# Altium PCB Interface-Board-v4.0.PcbDoc (part 1 of 3)
Units mil, origin at the board's own origin, x right, y up, seen from the top; angles counter-clockwise.
Board outline 1665.35 x 1665.35 mil, 4 copper layers (Top Layer, PWR, GND, Bottom Layer), stack 61.654 mil thick; 98 components, 76 nets, 345 pads, 193 vias.
Unrouted connection lines stored in the file: 69.
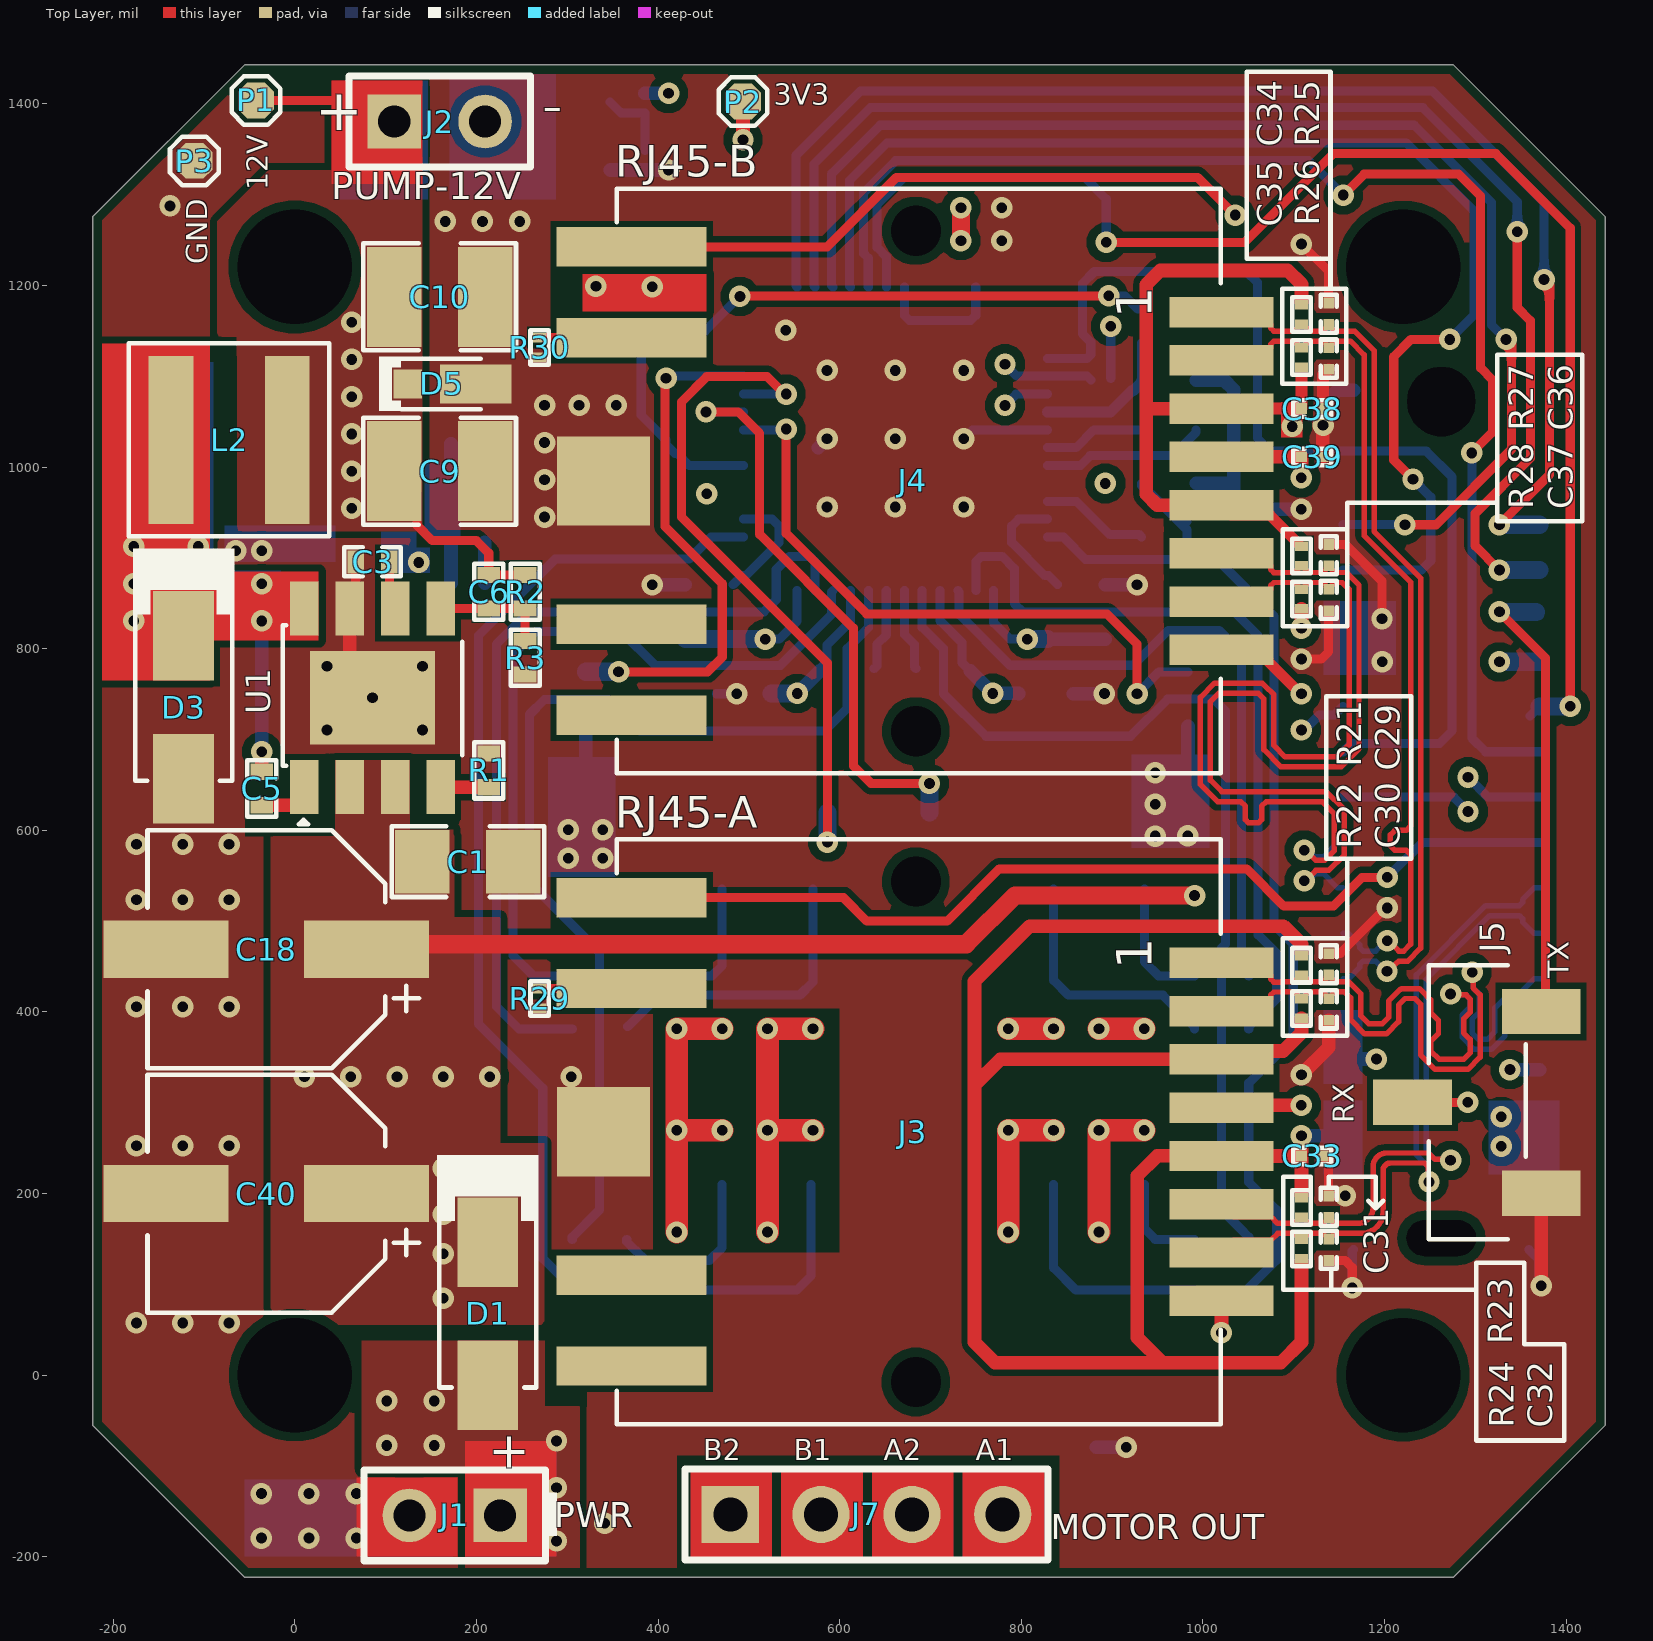
[diagram p0: Top Layer view]
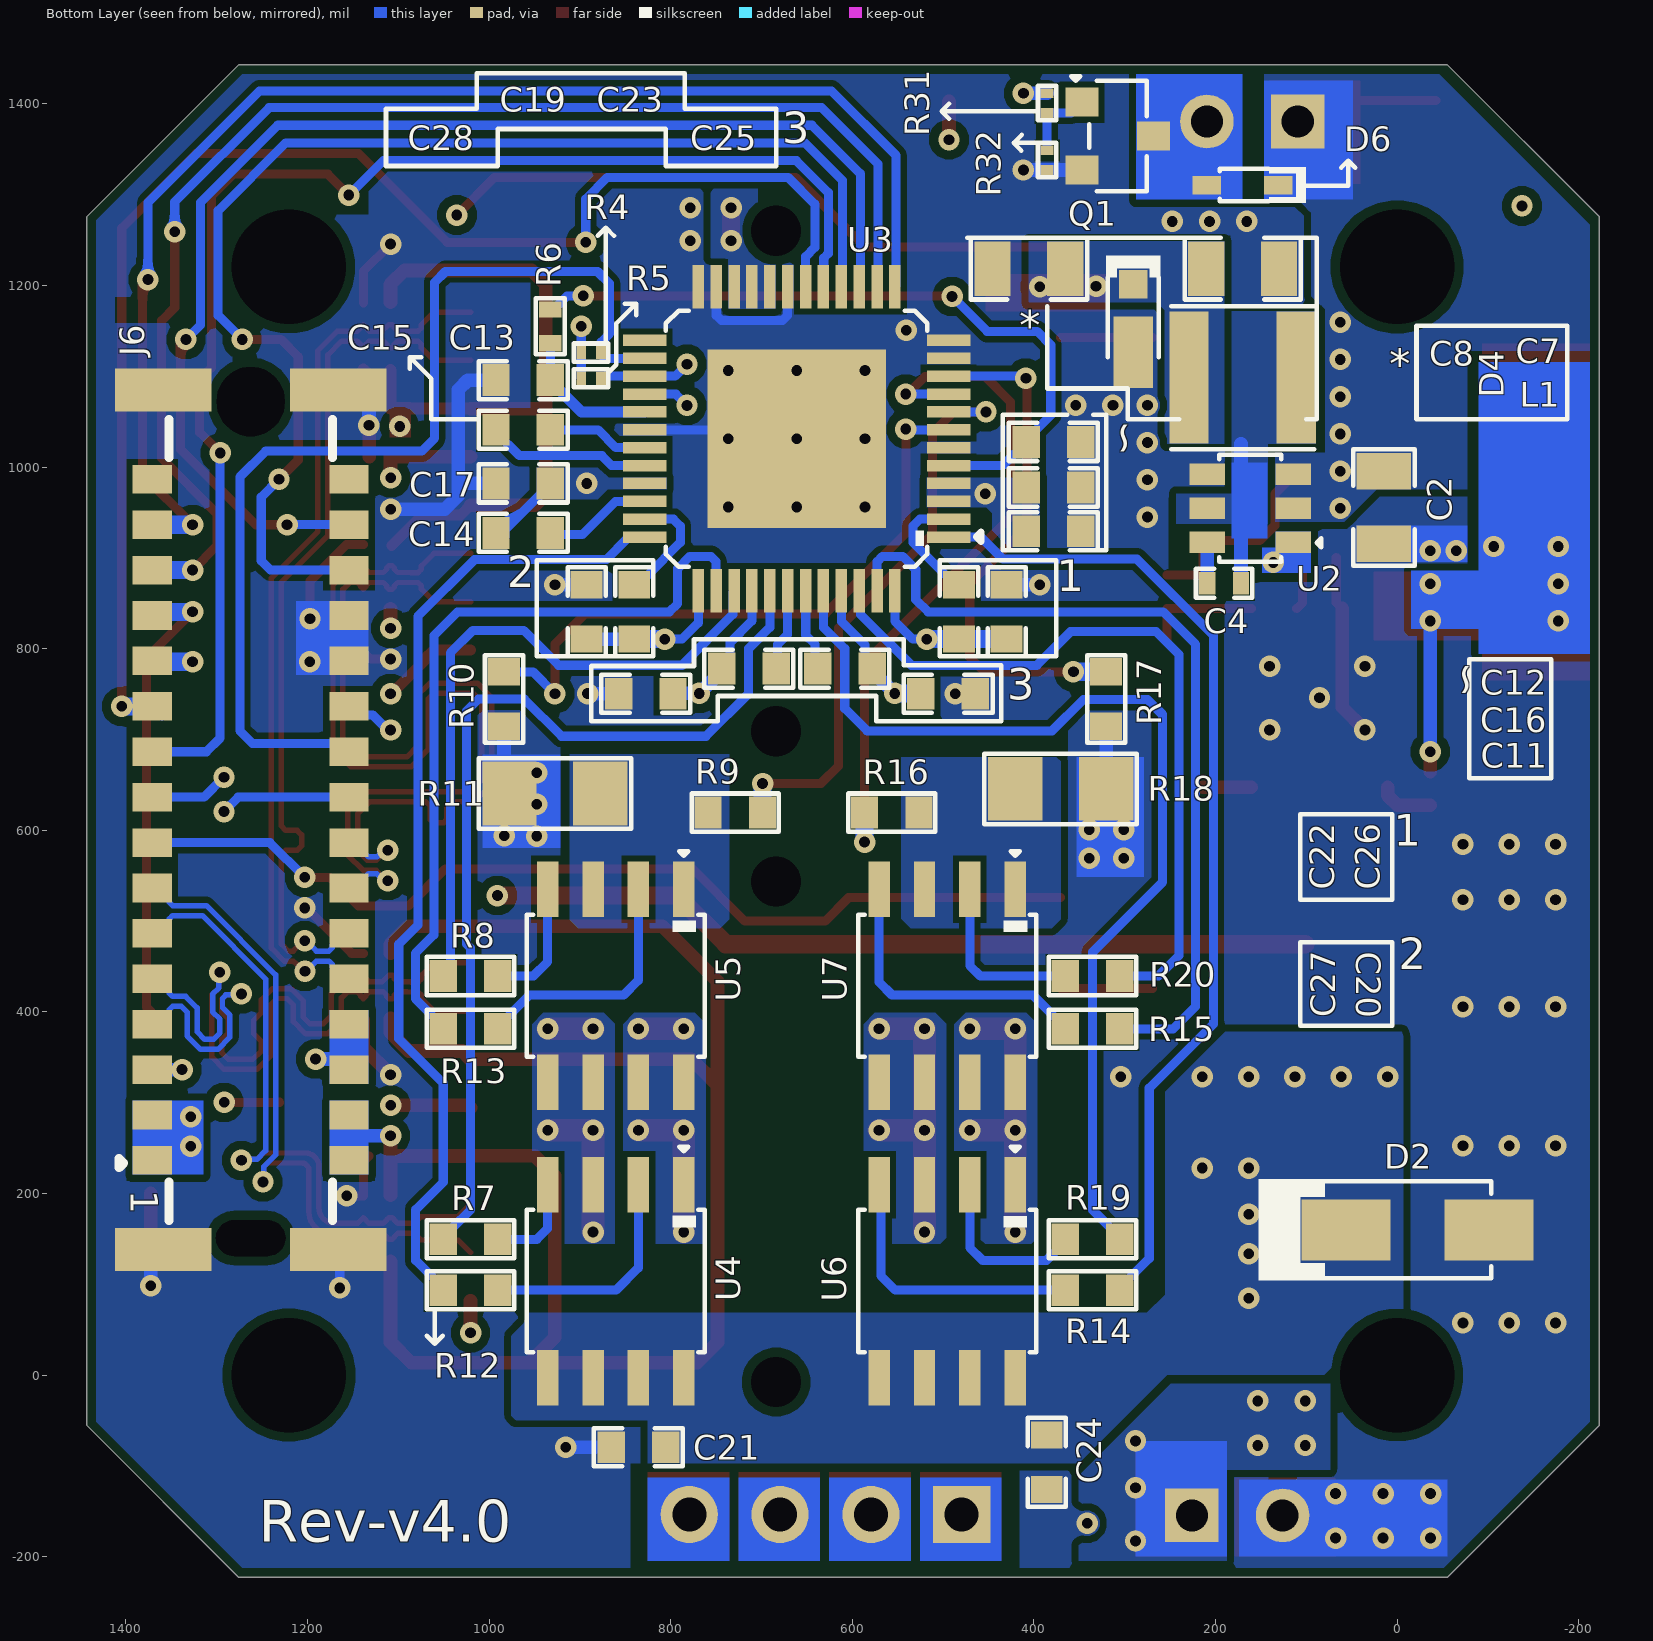
[diagram p1: Bottom Layer view, seen from below]
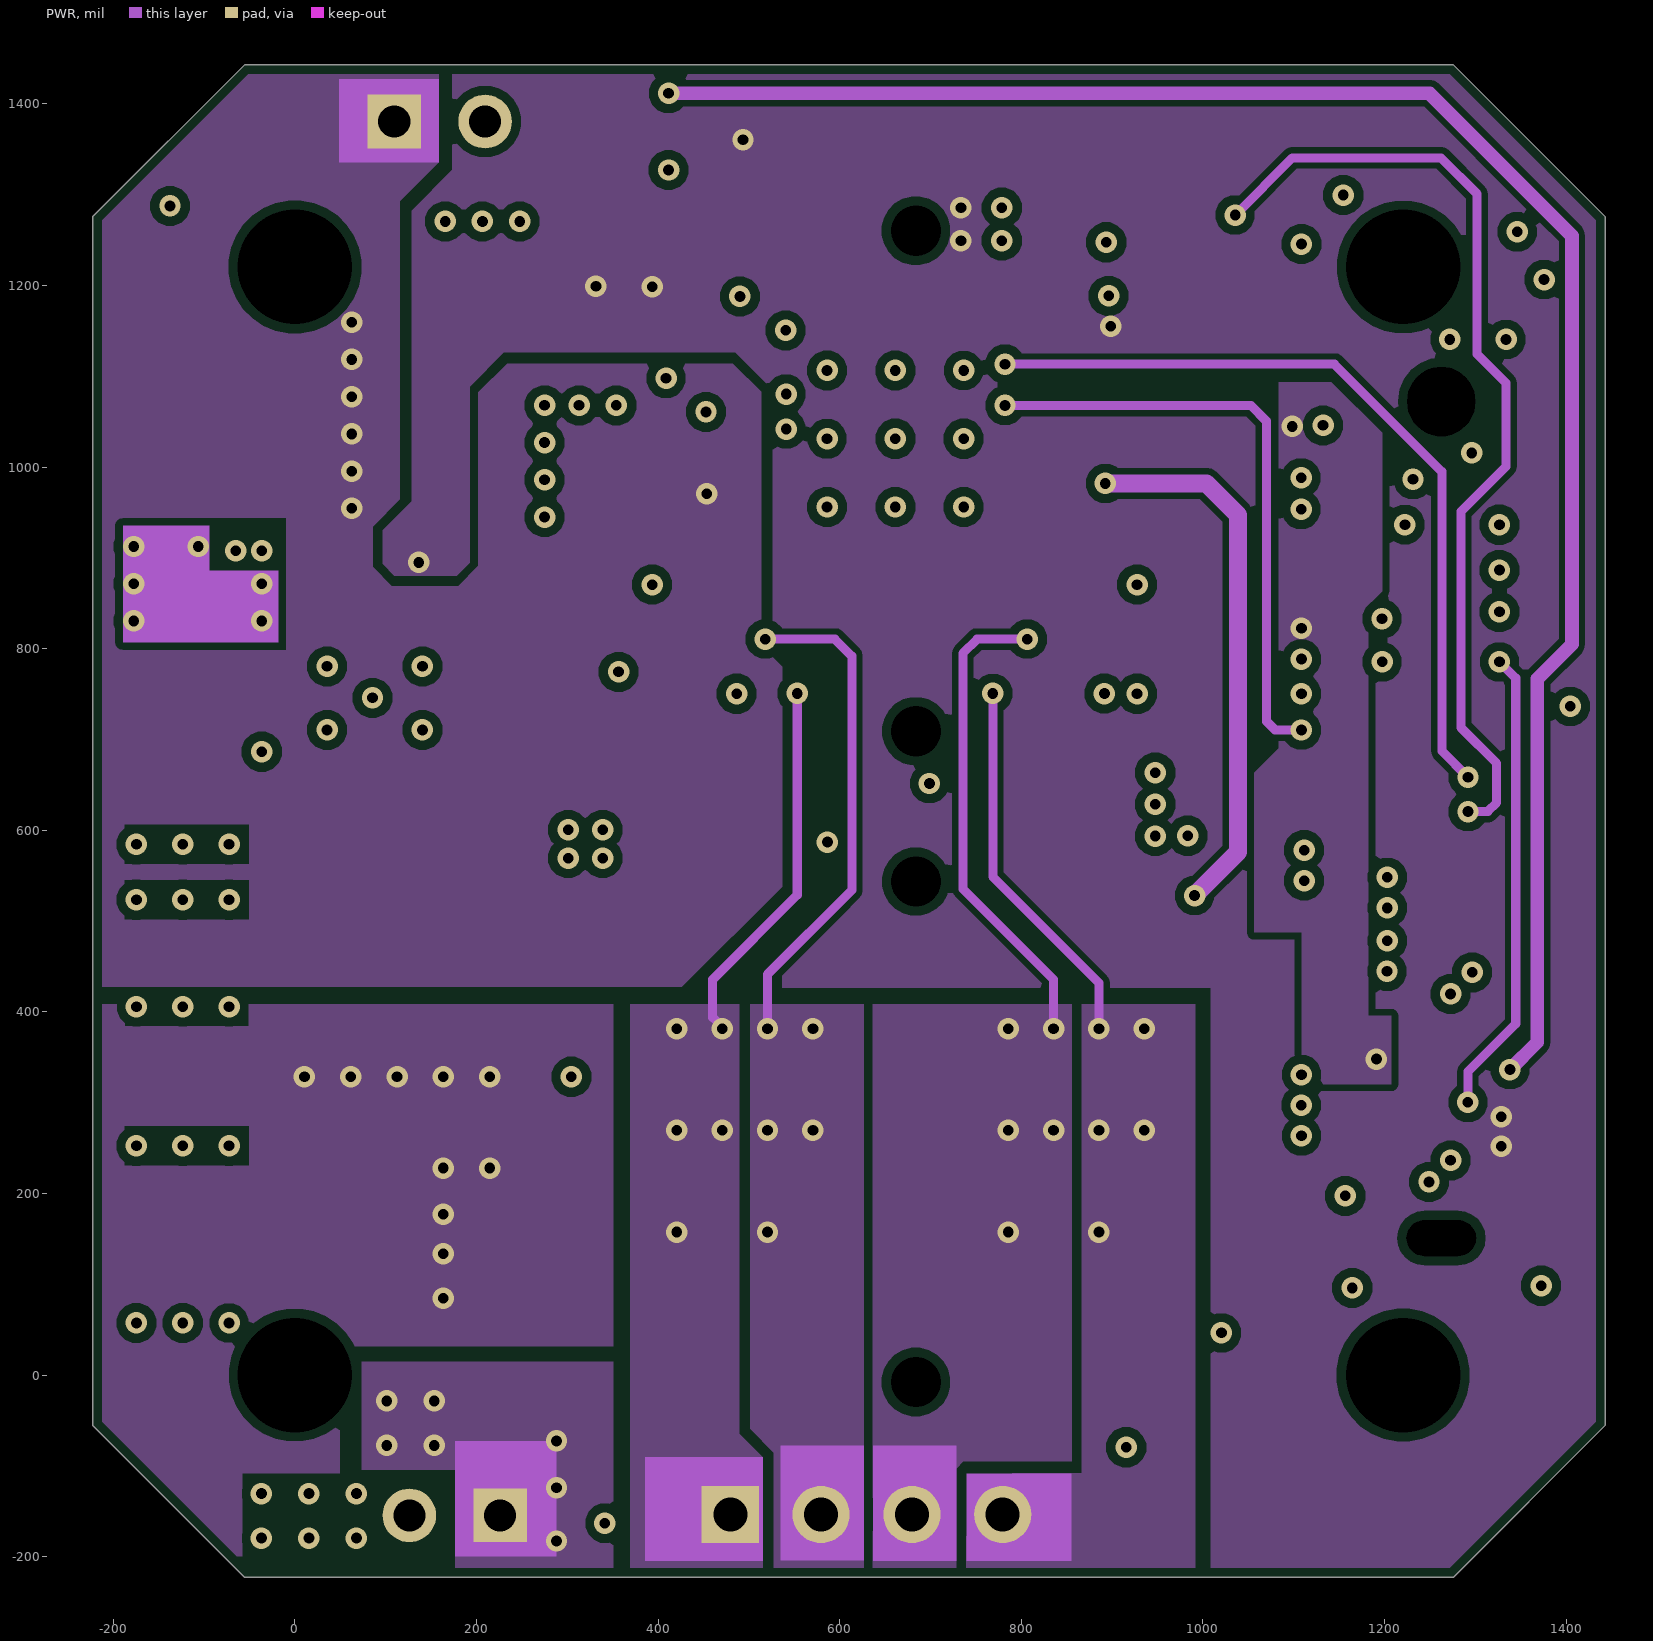
[diagram p2: PWR]
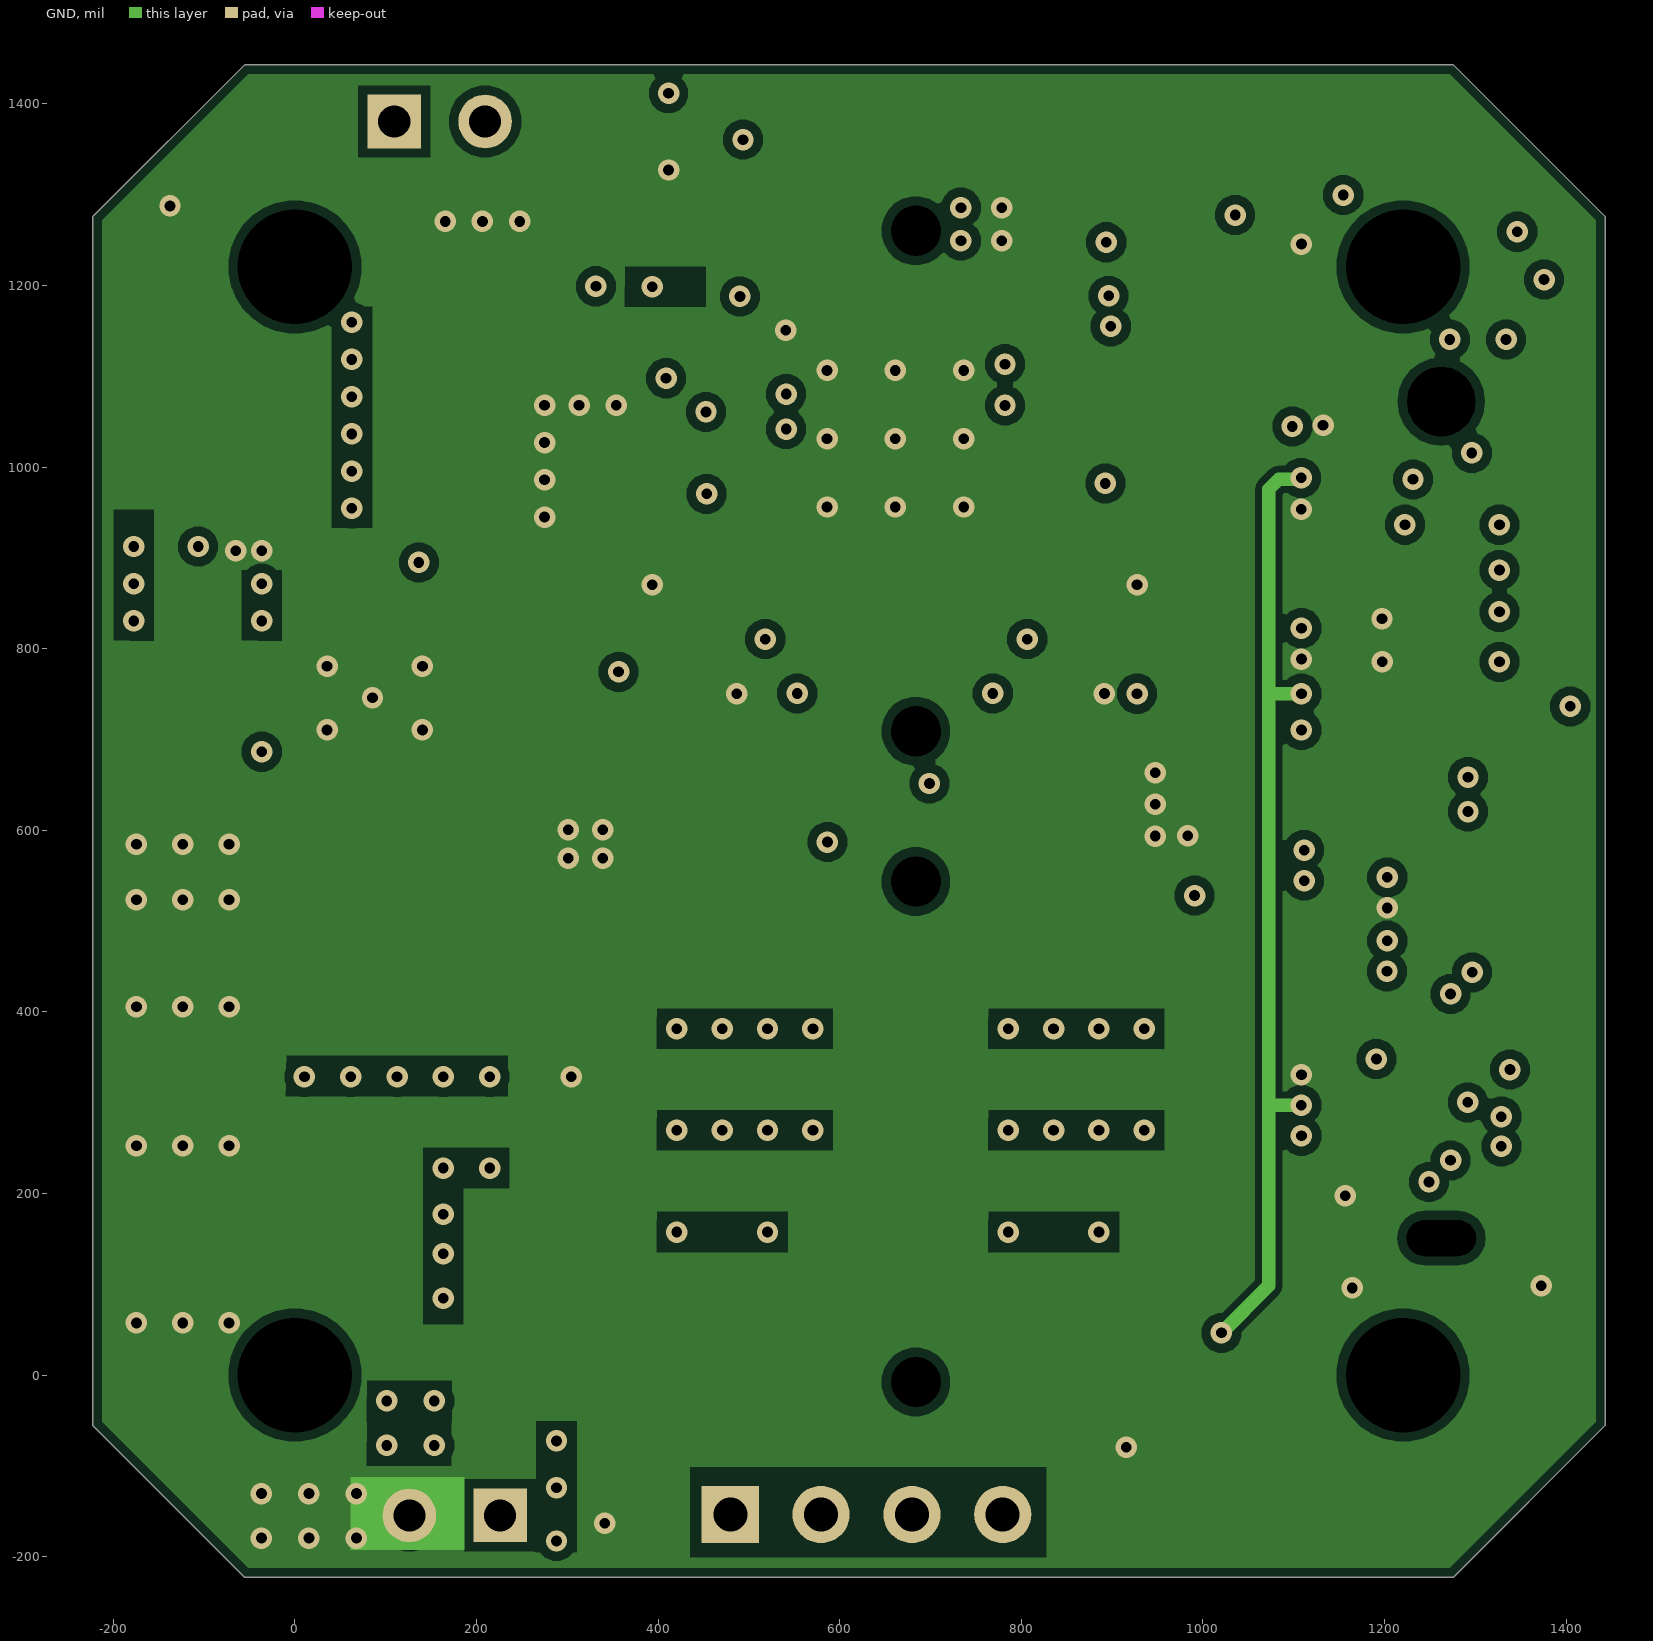
[diagram p3: GND]
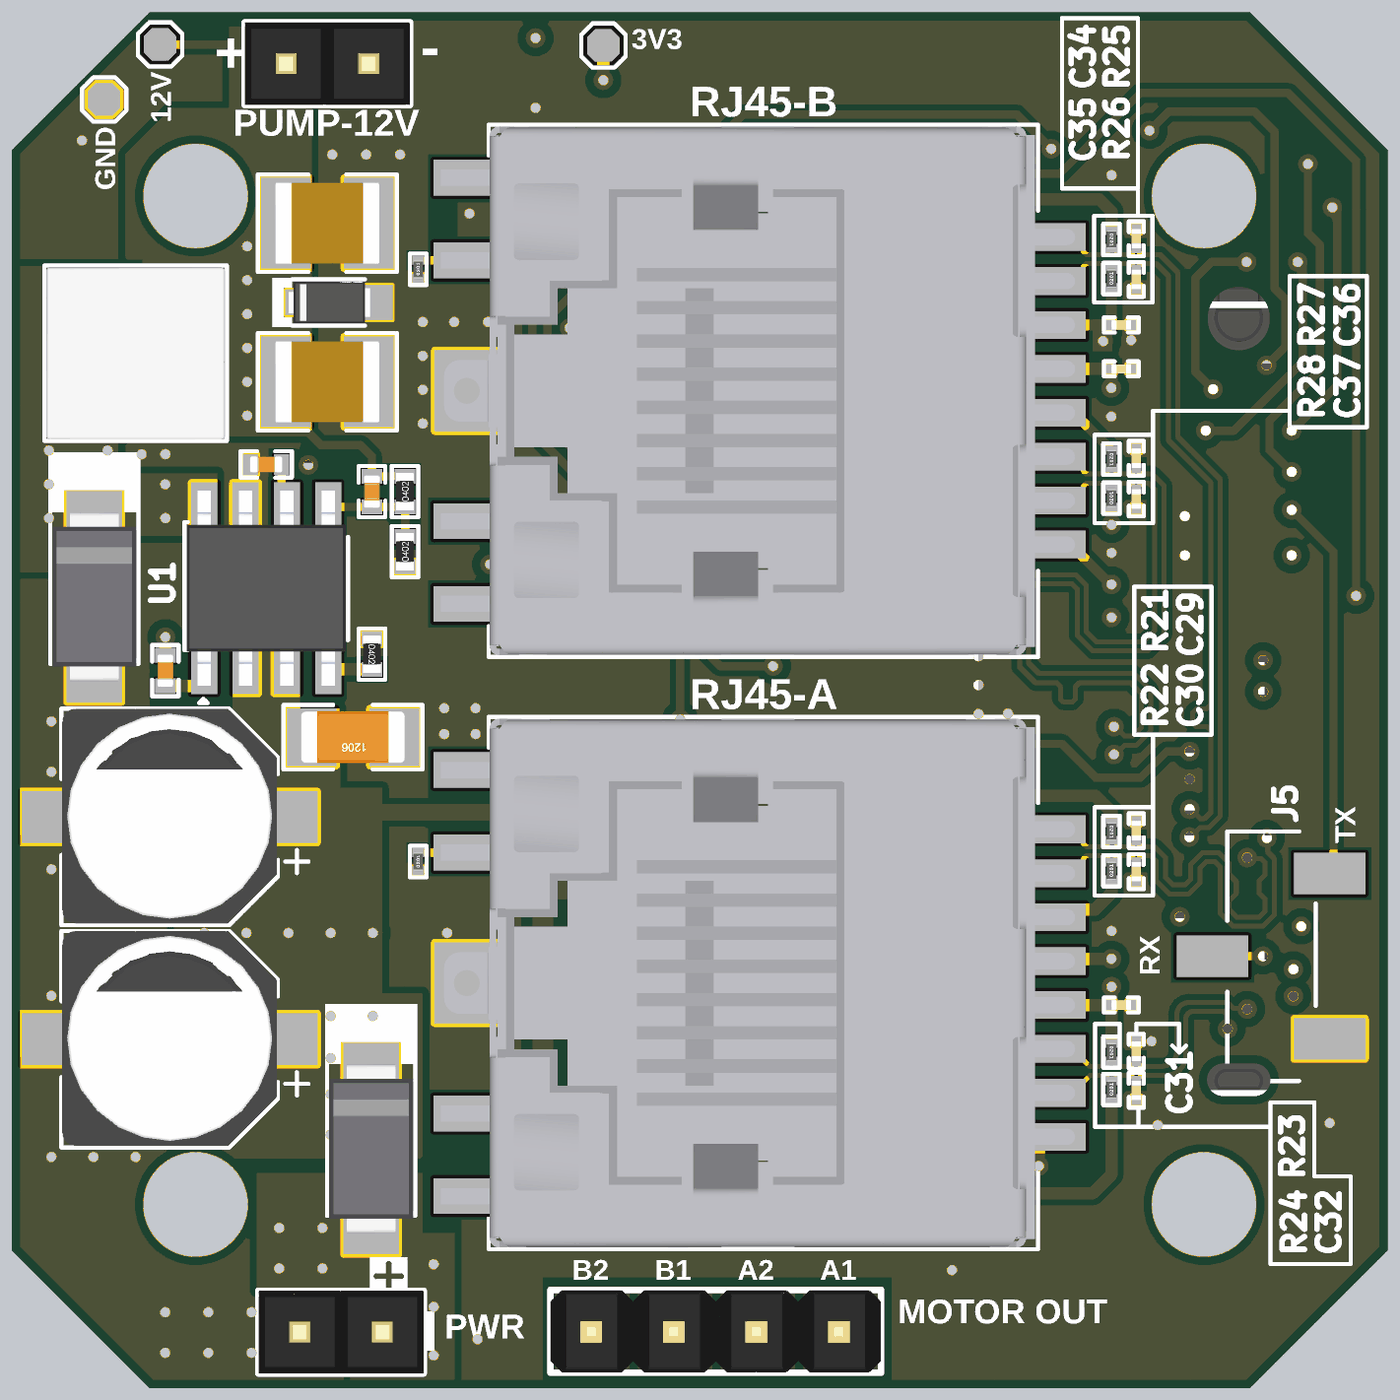
[diagram p5: 3D render of the assembled board from above, using the file's embedded part models]
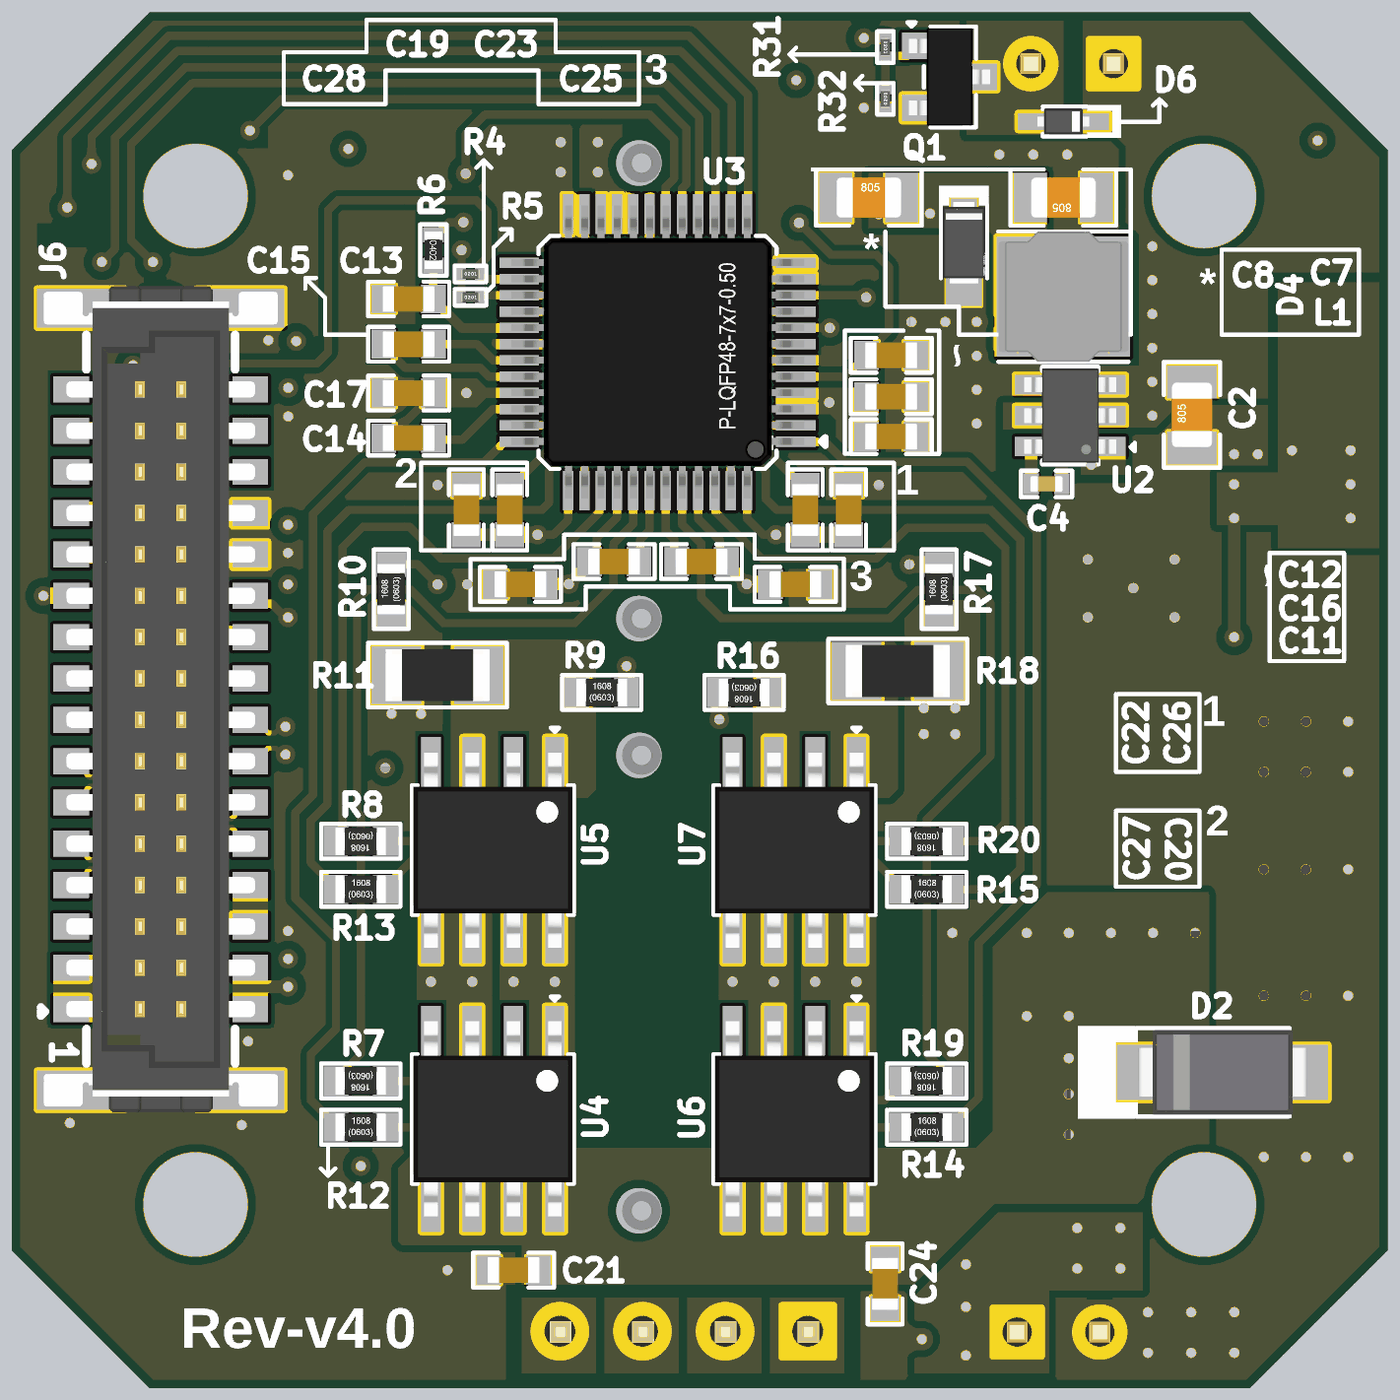
[diagram p6: 3D render of the assembled board from below, using the file's embedded part models]

## Layer stack, top to bottom
Top Solder: solder mask 0.7087, Solder Resist, Dk 3.5
Top Layer: signal copper 1.378
Dielectric 2: prepreg 7.9921, PP-006, Dk 4.4
PWR: signal copper 1.1811
Dielectric 1: core 40.5512, FR-4, Dk 4.6
GND: signal copper 1.1811
Dielectric 3: prepreg 7.9921, PP-006, Dk 4.4
Bottom Layer: signal copper 1.378
Bottom Solder: solder mask 0.7087, Solder Resist, Dk 3.5

## Board outline
-222.44,-55.41 -222.44,1275.88 -55.41,1442.91 1275.88,1442.91 1442.91,1275.88 1442.91,-55.41 1275.88,-222.44 -55.41,-222.44

## Design rules (kind name [scope] priority, off if disabled: settings)
BoardOutlineClearance [All] p1: gap=0 ignorepadtopadclearanceinfootprint=FALSE except(10: Poly-OutlineEdge)
Clearance [All] p1: gap=10 ignorepadtopadclearanceinfootprint=TRUE except(0: Arc-Hole Track-Hole SMDPad-Hole THPad-Hole Via-Hole Fill-Hole Region-Hole Text-Hole; 5: Arc-Arc Arc-Track Arc-SMDPad Track-Track Track-SMDPad; 7: Arc-Fill Arc-Poly Arc-Region Track-Fill Track-Poly Track-Region SMDPad-Fill SMDPad-Poly SMDPad-Region; 8: Fill-Fill Fill-Poly Fill-Region Poly-Poly Poly-Region Region-Region)
ComponentClearance [All] p1: gap=0 collisioncheckmode=3 verticalgap=0 showdistances=FALSE
DiffPairsRouting [All] p1: maxlimit=5 minlimit=5 mostfreqgap=5 toplayer_minwidth=6 toplayer_maxwidth=6 toplayer_prefwidth=6 midlayer1_minwidth=3.05 midlayer1_maxwidth=3.05 midlayer1_prefwidth=3.05 midlayer2_minwidth=3.05 midlayer2_maxwidth=3.05 midlayer2_prefwidth=3.05 bottomlayer_minwidth=6 bottomlayer_maxwidth=6 bottomlayer_prefwidth=6 impedanceprofiledriven=TRUE impedanceprofileid={466FECD8-43C7-4345-A135-0642FC9EC8CA} impedanceprofilevalue=100.000000 maxuncoupledlength=500
HoleSize [All] p1: absolutevalues=TRUE maxlimit=137.8 minlimit=1 maxpercent=80.000 minpercent=20.000
MatchedLengths "Schematic Matched Net Lengths_1" [InNetClass('EtherCAT_A')] p1: tolerance=20 checknetsindiffpair=FALSE checkdiffpairvsdiffpair=TRUE checkxsignals=TRUE checkothers=TRUE
MatchedLengths "Schematic Matched Net Lengths" [InNetClass('EtherCAT_B')] p2: tolerance=20 checknetsindiffpair=FALSE checkdiffpairvsdiffpair=TRUE checkxsignals=TRUE checkothers=TRUE
MaxMinImpedance "Schematic Impedance Constraint_1" [InNetClass('EtherCAT_A')] p1: minimum=85.00 maximum=95.00
MaxMinImpedance "Schematic Impedance Constraint" [InNetClass('EtherCAT_B')] p2: minimum=85.00 maximum=95.00
MinimumSolderMaskSliver [All] p1: minsoldermaskwidth=0
PolygonConnect [All] p1: thpad.connectstyle=Relief thpad.reliefconductorwidth=15 thpad.reliefentries=4 thpad.polygonreliefangle="45 Angle" thpad.airgapwidth=10 smdpad.connectstyle=Direct smdpad.reliefconductorwidth=10 smdpad.reliefentries=4 smdpad.polygonreliefangle="90 Angle" smdpad.airgapwidth=10 via.connectstyle=Direct via.reliefconductorwidth=10 via.reliefentries=4 via.polygonreliefangle="90 Angle" via.airgapwidth=10
RoutingVias [All] p1: holewidth=11.81 width=23.62 viastyle="Through Hole" minholewidth=11.81 minwidth=23.62 maxholewidth=11.81 maxwidth=23.62
SilkToSilkClearance [All] p1: silktosilkclearance=0
SilkToSolderMaskClearance [IsPad] p1: minsilkscreentomaskgap=0 clearancetoexposedcopper=TRUE
SolderMaskExpansion [All] p1: expansion=4 istentingtop=FALSE
UnRoutedNet [All] p1: checkbadconnections=TRUE
Width [All] p1: maxlimit=40 minlimit=7 preferedwidth=10
23 further rules are at their usual default settings.

## Classes and differential pairs
differential pair class EtherCAT_B_Lines: RXB TXB
differential pair class EtherCAT_A_Lines: RXA TXA
net class EtherCAT_B: RXB_N RXB_P TXB_N TXB_P
net class EtherCAT_A: RXA_N RXA_P TXA_N TXA_P
component class U_Stepper-Sheet: C11 C12 C13 C14 C15 C16 C17 C18 C19 C20 C21 C22 C23 C24 C25 C26 C27 C28 C40 R4 R5 R6 R7 R8 R9 R10 R11 R12 R13 R14 R15 R16 R17 R18 R19 R20 U3 U4 U5 U6 U7
component class U_Power-Sheet: C1 C2 C3 C4 C5 C6 C7 C8 C9 C10 D1 D2 D3 D4 D5 L1 L2 P1 P2 P3 R1 R2 R3 U1 U2
component class U_Connector-Sheet: C29 C30 C31 C32 C33 C34 C35 C36 C37 C38 C39 D6 J1 J2 J3 J4 J5 J6 J7 Q1 R21 R22 R23 R24 R25 R26 R27 R28 R29 R30 R31 R32
differential pair TXB: +TXB_P -TXB_N
differential pair TXA: +TXA_P -TXA_N
differential pair RXB: +RXB_P -RXB_N
differential pair RXA: +RXA_P -RXA_N

## Components (designator, comment, footprint, x,y, rotation, side; value= is the part's Value field where it differs from the comment)
C1 "4.7uF" Cap-1206 190.56,565.59 r180 top locked
C2 "10uF" Cap-0805 14.56,955.59 r90 bottom locked
C3 "15nF" Cap-0402 85.56,895.59 r0 top locked
C4 "0.1uF" Cap-0402 190.55,872.04 r180 bottom locked
C5 "0.1uF" Cap-0402 -36.44,646.09 r90 top locked
C6 "560pF" Cap-0402 213.56,862.75 r90 top locked
C7 "22uF" Cap-0805 170.19,1218.59 r0 bottom
C8 "22uF" Cap-0805 405.56,1218.59 r180 bottom
C9 "47uF" Cap-1210 159.56,995.59 r180 top locked
C10 "47uF" Cap-1210 159.56,1187.5 r180 top locked
C11 "2.2uF" CAP-0603 378.56,929.3 r0 bottom locked
C12 "2.2uF" CAP-0603 378.56,1027.73 r0 bottom locked
C13 "0.47uF" Cap-0603 962.56,1095.84 r180 bottom locked
C14 "0.1uF" Cap-0603 962.56,927.59 r0 bottom locked
C15 "22nF" Cap-0603 962.56,1041.11 r0 bottom locked
C16 "0.1uF" Cap-0603 378.56,977.59 r0 bottom locked
C17 "0.1uF" Cap-0603 962.56,982.06 r180 bottom locked
C18 "100uF" RVT1H101M0607 -31.5,469 r180 top locked
C19 "220nF" Cap-0603 713.86,778.09 r0 bottom locked
C20 "220nF" Cap-0603 840.16,840.59 r270 bottom locked
C21 "470nF" Cap-0603 835.56,-79.41 r0 bottom locked
C22 "220nF" Cap-0603 482.56,840.59 r270 bottom locked
C23 "220nF" Cap-0603 608.12,778.09 r180 bottom locked
C24 "470nF" Cap-0603 386,-96 r270 bottom
C25 "1nF" Cap-0603 494.61,750.43 r180 bottom locked
C26 "1nF" Cap-0603 430.09,840.59 r90 bottom locked
C27 "1nF" Cap-0603 892.61,840.59 r90 bottom locked
C28 "1nF" Cap-0603 827.37,750.43 r0 bottom locked
C29 "10pF" CAP-0201 1138.56,452.4 r90 top locked
C30 "10pF" CAP-0201 1138.56,402.8 r270 top locked
C31 "10pF" CAP-0201 1138.56,185.39 r90 top locked
C32 "10pF" CAP-0201 1138.56,138.11 r270 top locked
C33 "22nF" CAP-0201 1120.37,241.43 r0 top locked
C34 "10pF" CAP-0201 1138.56,1168.82 r90 top locked
C35 "10pF" CAP-0201 1138.56,1119.53 r270 top locked
C36 "10pF" CAP-0201 1138.56,903.07 r90 top locked
C37 "10pF" CAP-0201 1138.56,853.78 r270 top locked
C38 "22nF" CAP-0201 1120.37,1064.44 r0 top locked
C39 "1nF" CAP-0201 1120.37,1011.29 r0 top locked
C40 "100uF" RVT1H101M0607 -31.5,200 r180 top locked
D1 "SS56" SMA 212.56,67.59 r270 top locked
D2 "SMAJ48A" SMA -22.44,160 r180 bottom locked
D3 "SS36" SMA -122.44,735.59 r270 top locked
D4 "MSP3V3HM3/89A" MicroSMP 290.56,1163.99 r90 bottom
D5 "MSMP12A-M3/89A" MicroSMP 161.96,1091.59 r180 top locked
D6 "1N4148WT" SOD-523F 170.19,1310.59 r180 bottom locked
J1 "X6511WV-02H-C60D30" HDR1X2_ 226.13,-154.41 r180 top locked
J2 "X6511WV-02H-C60D30" HDR1X2_ 109.56,1380.59 r0 top locked
J3 "HR963370A" HR963370A 695.67,268 r90 top locked
J4 "HR963370A" HR963370A 695.67,984.72 r90 top locked
J5 "X6511WVS-03H-C60D48R1" HDR1X3-SMD 1301.64,300.48 r270 top locked
J6 "M55-7013242R" M55-7013242R 1262.56,611.56 r270 bottom locked
J7 "X6511WV-04H-C60D30" HDR1X4_ 479.56,-153.41 r0 top locked
L1 "3.9uH" FNR4030S3R9MT 170.19,1098.59 r0 bottom
L2 "15uH" FEXL0550A-150M -72.44,1030 r0 top locked
P1 "TEST POINT 0.5mm Dia" "Test-point - 0.5mm" -42.8,1403.84 r0 top locked
P2 "TEST POINT 0.5mm Dia" "Test-point - 0.5mm" 493.56,1402.59 r0 top locked
P3 "TEST POINT 0.5mm Dia" "Test-point - 0.5mm" -110.6,1337.3 r0 top locked
Q1 "IRLML2502TRPBF" SOT-23 307.93,1364.59 r270 bottom locked
R1 "45.3k" Res-0402 213.56,666.09 r270 top locked value=45.3kR
R2 "150K" Res-0402 253.56,862.75 r90 top locked
R3 "10K" Res-0402 253.56,790.09 r90 top locked
R4 "47K" Res-0201 887.7,1126.15 r180 bottom locked value=47kR
R5 "47K" Res-0201 887.7,1097.87 r180 bottom locked value=47kR
R6 "2.2R" Res-0402 932.56,1155.09 r270 bottom locked
R7 "22R" Res-0603 1020.56,149.59 r180 bottom locked
R8 "22R" Res-0603 1020.56,439.59 r180 bottom locked
R9 "47R" Res-0603 728.86,619.59 r0 bottom locked
R10 "47R" Res-0603 983.56,744.59 r270 bottom locked
R11 "75mR" Res-1206 927.56,640.59 r180 bottom locked
R12 "22R" Res-0603 1020.56,93.59 r0 bottom locked
R13 "22R" Res-0603 1020.56,381.43 r0 bottom locked
R14 "22R" Res-0603 335.56,93.59 r0 bottom locked
R15 "22R" Res-0603 335.56,381.43 r0 bottom locked
R16 "47R" Res-0603 556.56,619.59 r180 bottom locked
R17 "47R" Res-0603 320.56,744.59 r270 bottom locked
R18 "75mR" Res-1206 370.56,645.59 r0 bottom locked
R19 "22R" Res-0603 335.56,149.59 r180 bottom locked
R20 "22R" Res-0603 335.56,439.59 r180 bottom locked
R21 "49.9R" Res-0201 1108.56,451.42 r270 top locked
R22 "49.9R" Res-0201 1108.56,403.78 r90 top locked
R23 "49.9R" Res-0201 1108.56,184.41 r270 top locked
R24 "49.9R" Res-0201 1108.56,139.1 r90 top locked
R25 "49.9R" Res-0201 1108.56,1167.84 r270 top locked
R26 "49.9R" Res-0201 1108.56,1120.51 r90 top locked
R27 "49.9R" Res-0201 1108.56,902.09 r270 top locked
R28 "49.9R" Res-0201 1108.56,854.77 r90 top locked
R29 "330R" Res-0201 269.54,415.05 r90 top locked
R30 "330R" Res-0201 269.54,1131.77 r90 top locked
R31 "33R" Res-0201 385.56,1400.77 r270 bottom locked
R32 "10K" Res-0201 385.56,1338.02 r90 bottom locked
U1 "LMR16030SDDAR" 8-SO-EP_ 85.56,745.92 r90 top locked
U2 "AP63203WU-7" TSOT-23-6 161.8,954.72 r0 bottom locked
U3 "TMC2160A-TA-T" 48-TQFP-EP(7x7) 661.35,1031.27 r0 bottom locked
U4 "AOSD62666E" SOIC-8 860.56,103.59 r270 bottom locked
U5 "AOSD62666E" SOIC-8 860.56,428.89 r270 bottom locked
U6 "AOSD62666E" SOIC-8 495.56,103.59 r270 bottom locked
U7 "AOSD62666E" SOIC-8 495.56,428.89 r270 bottom locked

## Footprints (in the part's own frame and the unit in brackets; to place one, negate y for a bottom-side part, rotate by r counter-clockwise, add the part's x,y. Pads: shape width x height; smd on the part's side, far side on the other; paste and mask are expansions set on the pad)
8-SO-EP_ [mm]
  rect 1.505x0.802 smd: 1(-2.497,1.905) 2(-2.497,0.635) 3(-2.497,-0.635) 4(-2.497,-1.905) 5(2.498,-1.905) 6(2.498,-0.635) 7(2.498,0.635) 8(2.498,1.905)
  rect 2.613x3.502 smd: 9(0,0)
  silkscreen extent -3.53,-2.51 2.03,2.51, body extent -3,-2.45 3,2.45, height 1.7
48-TQFP-EP(7x7) [mm]
  rect 1.22x0.32 smd: 1(-4.25,2.75) 2(-4.25,2.25) 3(-4.25,1.75) 4(-4.25,1.25) 5(-4.25,0.75) 6(-4.25,0.25) 7(-4.25,-0.25) 8(-4.25,-0.75) 9(-4.25,-1.25) 10(-4.25,-1.75) 11(-4.25,-2.25) 12(-4.25,-2.75) 25(4.25,-2.75) 26(4.25,-2.25) 27(4.25,-1.75) 28(4.25,-1.25) 29(4.25,-0.75) 30(4.25,-0.25) 31(4.25,0.25) 32(4.25,0.75) 33(4.25,1.25) 34(4.25,1.75) 35(4.25,2.25) 36(4.25,2.75)
  rect 0.32x1.22 smd: 13(-2.75,-4.25) 14(-2.25,-4.25) 15(-1.75,-4.25) 16(-1.25,-4.25) 17(-0.75,-4.25) 18(-0.25,-4.25) 19(0.25,-4.25) 20(0.75,-4.25) 21(1.25,-4.25) 22(1.75,-4.25) 23(2.25,-4.25) 24(2.75,-4.25) 37(2.75,4.25) 38(2.25,4.25) 39(1.75,4.25) 40(1.25,4.25) 41(0.75,4.25) 42(0.25,4.25) 43(-0.25,4.25) 44(-0.75,4.25) 45(-1.25,4.25) 46(-1.75,4.25) 47(-2.25,4.25) 48(-2.75,4.25)
  rect 5x5 smd: 49(0,0)
  silkscreen extent -5.16,-3.58 3.66,3.58, body extent -4.51,-4.51 4.49,4.49, height 1.43
CAP-0201 [mm]
  rect 0.3x0.3 smd mask+0.055: 1(-0.3,0) 2(0.3,0)
  silkscreen extent -0.53,-0.23 0.53,0.23, body extent -0.3,-0.15 0.3,0.15, height 0.28
Cap-0402 [mil]
  rect 18x25 smd mask+2.36: 1(-18.5,0) 2(18.5,0)
  silkscreen extent -31,-16 31,16, body extent -20,-10 20,10, height 19
CAP-0603 [mil]
  rect 30x35 smd mask+2.36: 1(-30,0) 2(30,0)
  silkscreen extent -49,-21 49,21, body extent -32,-16 31,16, height 34
Cap-0603 [mil]
  rect 30x35 smd mask+2.36: 1(-30,0) 2(30,0)
  silkscreen extent -49,-21 49,21, body extent -32,-16 31,16, height 34
Cap-0805 [mil] "SMD 0805"
  rect 40x60 smd mask+2.76: 1(-40,0) 2(40,0)
  silkscreen extent -64,-34 64,34, body extent -39,-25 39,25, height 30
Cap-1206 [mil] "SMD 1206"
  rect 60x70 smd: 1(-50,0) 2(50,0)
  silkscreen extent -84,-39 84,39, body extent -63,-31 63,32, height 39
Cap-1210 [mil] "SMD 1210"
  rect 60x110 smd: 1(-50,0) 2(50,0)
  silkscreen extent -84,-59 84,59, body extent -63,-49 63,49, height 39
FEXL0550A-150M [mm]
  rect 1.25x4.7 smd: 1(-1.625,0) 2(1.625,0)
  silkscreen extent -2.8,-2.69 2.8,2.7, body extent -2.75,-2.65 2.75,2.65, height 4.8
FNR4030S3R9MT [mm]
  rect 1.1x3.7 smd: 1(-1.5,0) 2(1.5,0)
  silkscreen extent -2,-2 2,2, body extent -2,-2 2,2, height 2.61
HDR1X2_ [mm] "CONN HEADER VERT 2POS 2.54MM"
  rect 1.5x1.5 hole 0.9: 1(0,0)
  round 1.5 hole 0.9: 2(2.54,0)
  silkscreen extent -1.27,-1.27 3.81,1.27, body extent -1.27,-1.27 3.81,1.27, height 8.44
HDR1X3-SMD [mm]
  rect 1.27x2.2 smd: 1(-2.54,1.8) 2(0,-1.8) 3(2.54,1.8)
  silkscreen extent -3.84,-1.35 3.84,1.37, body extent -3.81,-2.54 3.81,2.54, height 10.16
HDR1X4_ [mm] "Connector; Header; 4 Position"
  rect 1.6x1.6 hole 0.95: 1(0,0)
  round 1.6 hole 0.95: 2(2.54,0) 3(5.08,0) 4(7.62,0)
  silkscreen extent -1.27,-1.27 8.89,1.27, body extent -1.27,-1.27 8.89,1.27, height 9.5
HR963370A [mm]
  rect 0.85x2.9 smd: 1(4.725,-8.25) 2(3.375,-8.25) 3(2.025,-8.25) 4(0.675,-8.25) 5(-0.675,-8.25) 6(-2.025,-8.25) 7(-3.375,-8.25) 8(-4.725,-8.25)
  rect 1.1x4.2 smd: 9(6.55,8.25) 10(4.01,8.25) 11(-4.01,8.25) 12(-6.55,8.25)
  rect 2.5x2.6 smd: EP(0,9.029)
  round 0 hole 1.4 unplated: MH1(-7,0.3) MH2(7,0.3)
  silkscreen extent -8.18,-8.23 8.18,8.66, body extent -8.13,-9.37 8.13,10.13, height 16.85
M55-7013242R [mm]
  rect 0.8x1.1 smd: A1(9.525,-2.75) A2(8.255,-2.75) A3(6.985,-2.75) A4(5.715,-2.75) A5(4.445,-2.75) A6(3.175,-2.75) A7(1.905,-2.75) A8(0.635,-2.75) A9(-0.635,-2.75) A10(-1.905,-2.75) A11(-3.175,-2.75) A12(-4.445,-2.75) A13(-5.715,-2.75) A14(-6.985,-2.75) A15(-8.255,-2.75) A16(-9.525,-2.75) B1(9.525,2.75) B2(8.255,2.75) B3(6.985,2.75) B4(5.715,2.75) B5(4.445,2.75) B6(3.175,2.75) B7(1.905,2.75) B8(0.635,2.75) B9(-0.635,2.75) B10(-1.905,2.75) B11(-3.175,2.75) B12(-4.445,2.75) B13(-5.715,2.75) B14(-6.985,2.75) B15(-8.255,2.75) B16(-9.525,2.75)
  round 0 hole 1 slot 1.95 at 90 deg unplated: MH(11.7,0)
  round 0 hole 1.9 slot 1.95 at 0 deg unplated: MH1(-11.7,0)
  rect 1.2x2.7 smd: MP1(-12.02,-2.45) MP2(-12.02,2.45) MP3(12.02,2.45) MP4(12.02,-2.45)
  silkscreen extent -11.2,-3.68 11.2,2.29, body extent -12.7,-3.6 12.7,3.6, height 8.25
MicroSMP [mm]
  rect 2x1.1 smd paste+0 mask+0.051: 1(-0.95,0)
  rect 0.8x0.8 smd paste+0 mask+0.051: 2(0.95,0)
  silkscreen extent -1.09,-0.76 1.75,0.76, body extent -1.25,-0.65 1.25,0.65, height 0.66
Res-0201 [mm]
  rect 0.27x0.37 smd mask+0.055: 1(-0.275,0) 2(0.275,0)
  silkscreen extent -0.48,-0.25 0.48,0.25, body extent -0.3,-0.15 0.3,0.15, height 0.29
Res-0402 [mil]
  rect 18x25 smd mask+2.17: 1(-18.5,0) 2(18.5,0)
  silkscreen extent -32,-17 32,16, body extent -23,-11 23,11, height 16
Res-0603 [mil]
  rect 30x35 smd: 1(-30,0) 2(30,0)
  silkscreen extent -48,-21 48,21, body extent -31,-17 31,17, height 18
Res-1206 [mil]
  rect 60x70 smd: 1(-50,0) 2(50,0)
  silkscreen extent -84,-39 84,39, body extent -63,-31 63,31, height 24
RVT1H101M0607 [mm]
  rect 3.5x1.6 smd: 1(-2.8,0) 2(2.8,0)
  silkscreen extent -4.27,-3.33 3.32,3.33, body extent -3.31,-3.33 3.29,3.27, height 7.94
SMA [mm]
  rect 2.5x1.7 smd: 1(-2,0) 2(2,0)
  silkscreen extent -4.44,-1.42 2.06,1.42, body extent -2.6,-1.3 2.6,1.3, height 2.4
SOD-523F [mm]
  rect 0.8x0.52 smd: 1(-1,0) 2(1,0)
  silkscreen extent -0.64,-0.51 1.78,0.51, body extent -0.8,-0.4 0.8,0.4, height 0.7
SOIC-8 [mm]
  rect 1.55x0.6 smd: 1(-2.7,1.905) 2(-2.7,0.635) 3(-2.7,-0.635) 4(-2.7,-1.905) 5(2.7,-1.905) 6(2.7,-0.635) 7(2.7,0.635) 8(2.7,1.905)
  silkscreen extent -3.76,-2.49 1.99,2.49, body extent -3,-2.45 3,2.45, height 1.7
SOT-23 [mm] "TRANS NPN 40V 0.6A SOT23"
  rect 0.82x0.92 smd: 1(-0.95,-1) 2(0.95,-1) 3(0,1)
  silkscreen extent -1.68,-1.3 1.55,0.81, body extent -1.5,-1.25 1.5,1.25, height 1.05
"Test-point - 0.5mm" [mm]
  oct 1x1 smd: 1(0,0)
  silkscreen extent -0.68,-0.68 0.68,0.68
TSOT-23-6 [mm]
  rect 1x0.6 smd: 1(-1.2,0.95) 2(-1.2,0) 3(-1.2,-0.95) 4(1.2,-0.95) 5(1.2,0) 6(1.2,0.95)
  silkscreen extent -1.98,-1.5 0.86,1.5, body extent -1.41,-1.45 1.41,1.45, height 1

## Part data
C1: library part GRM31CZ72A475KE11L, "CAP CER, 4.7 uF, 100 V, ± 10%, X7R, 1206 [3216 Metric]", Case/Package=340Case, LCSC Part Number=C2997285, Manufacturer=Murata, Max Operating Temperature=125°C, Min Operating Temperature=-55°C, Supplier Part Number=490-GRM31CZ72A475KE11LCT-ND, Tolerance=10%, Voltage Rating=100V, Category="Ceramic Capacitors", ComponentLink1Description=LCSC, ComponentLink1URL=https://www.lcsc.com/product-detail/Multilayer-Ceramic-Capacitors-MLCC-SMD-SMT_Murata-Electronics-GRM31CZ72A475KE11L_C2997285.html, Height=1.9mm, Item Type=Capacitor, Length=3.2mm, Manufacturer Part Number=GRM31CZ72A475KE11L, Material=4241ConductorMaterial, Pricing="1=0.76, 10=0.53, 50=0.4462, 100=0.3633, 500=0.30274, 1000=0.25495 (USD)", RoHS=Yes, RoHS Compliant=Yes, Stock=152, Supplier=Digi-Key, Thickness=1.6mm, Width=1.6mm
C2: library part CL21B106KAYQNNE, "25V 10uF X7R ±10% 0805 Multilayer Ceramic Capacitors MLCC - SMD/SMT ROHS", LCSC Part Number=C3039694, Manufacturer="Samsung Electro-Mechanics", Package=0805, ComponentLink1Description=LCSC, ComponentLink1URL=https://www.lcsc.com/product-detail/Multilayer-Ceramic-Capacitors-MLCC-SMD-SMT_Samsung-Electro-Mechanics-CL21B106KAYQNNE_C3039694.html, Item Type=Capacitor, Manufacturer Part Number=CL21B106KAYQNNE
C3: library part CC0402KRX7R9BB153, "CAP CER 0.015UF 50V X7R 0402", Case/Package=0402, Dielectric=X7R, LCSC Part Number=C114405, Manufacturer=Yageo, Max Operating Temperature=125°C, Min Operating Temperature=-55°C, Supplier Part Number=1105976, Tolerance=10%, Voltage Rating=50V, Category="Ceramic Capacitors", ComponentLink1Description=https://datasheet.octopart.com/CC0402KRX7R9BB153-Yageo-datasheet-166511530.pdf?src-supplier=Future+Electronics, ComponentLink1URL=https://datasheet.octopart.com/CC0402KRX7R9BB153-Yageo-datasheet-166511530.pdf?src-supplier=Future+Electronics, ComponentLink2Description=https://datasheet.octopart.com/CC0402KRX7R9BB153-Yageo-datasheet-147453679.pdf?src-supplier=Newark, ComponentLink2URL=https://datasheet.octopart.com/CC0402KRX7R9BB153-Yageo-datasheet-147453679.pdf?src-supplier=Newark, ComponentLink3Description=http://www.yageo.com/documents/recent/UPY-GPHC_X7R_6.3V-to-50V_18.pdf?src-supplier=Digi-Key, ComponentLink3URL=http://www.yageo.com/documents/recent/UPY-GPHC_X7R_6.3V-to-50V_18.pdf?src-supplier=Digi-Key, ComponentLink4Description=https://www.yageo.com/upload/media/product/productsearch/datasheet/mlcc/UPY-GPHC_X7R_6.3V-to-50V_18.pdf?src-supplier=Digi-Key, ComponentLink4URL=https://www.yageo.com/upload/media/product/productsearch/datasheet/mlcc/UPY-GPHC_X7R_6.3V-to-50V_18.pdf?src-supplier=Digi-Key, ComponentLink5Description=https://datasheet.octopart.com/CC0402KRX7R9BB153-Yageo-datasheet-151948686.pdf?src-supplier=Farnell, ComponentLink5URL=https://datasheet.octopart.com/CC0402KRX7R9BB153-Yageo-datasheet-151948686.pdf?src-supplier=Farnell, ComponentLink6Description=http://www.yageo.com/exep/pages/download/literatures/ProductSelectionGuide%202014_Final_2.pdf?src-supplier=Digi-Key, ComponentLink6URL=http://www.yageo.com/exep/pages/download/literatures/ProductSelectionGuide%202014_Final_2.pdf?src-supplier=Digi-Key, Halogen Free="Halogen Free", Item Type=Capacitor, Lead Free="Lead Free", Length=0.039inch, Manufacturer Part Number=CC0402KRX7R9BB153, Mounting Technology="Surface Mount", Packaging="Tape and Reel", Pricing="10000=0.0032, 40000=0.0031, 150000=0.0029, 250000=0.0028, 500000=0.0027 (USD)", RoHS=Yes, RoHS Compliant=Yes, Series=CC, Stock=10000, Supplier="Future Electronics", Thickness=0.022inch, Voltage Rating (DC)=50V, Width=0.02inch
C4 C5: library part CL05B104KB54PNC, "CAP CER 0.1UF 50V X7R 0402", LCSC Part Number=C307331, Manufacturer=Samsung, Supplier Part Number 1=1276-CL05B104KB54PNCDKR-ND, Manufacturer Part Number=CL05B104KB54PNC, Pricing 1="1=0.1, 10=0.067, 50=0.0366, 100=0.0299, 500=0.02138, 1000=0.01681, 2500=0.01528, 5000=0.01406 (USD)", Stock 1=8594, Supplier 1=Digi-Key
C6: library part CC0402JRX7R9BB561, "CAP CER 560PF 50V X7R 0402", Case Code (Imperial)=0402, Case Code (Metric)=1005, Dielectric=X7R, LCSC Part Number=C541456, Manufacturer=Yageo, Max Operating Temperature=125°C, Min Operating Temperature=-55°C, Supplier Part Number=5465612, Tolerance=5%, Voltage Rating=50V, Case/Package=0402, Category="Ceramic Capacitors", ComponentLink1Description=https://datasheet.ciiva.com/26862/getdatasheetpartid-403463-26862618.pdf?src-supplier=Verical, ComponentLink1URL=https://datasheet.ciiva.com/26862/getdatasheetpartid-403463-26862618.pdf?src-supplier=Verical, ComponentLink2Description=https://datasheet.ciiva.com/11464/upy-gphc-x7r-6-3v-to-50v-8-11464855.pdf?src-supplier=Avnet, ComponentLink2URL=https://datasheet.ciiva.com/11464/upy-gphc-x7r-6-3v-to-50v-8-11464855.pdf?src-supplier=Avnet, ComponentLink3Description=https://datasheet.ciiva.com/13210/upy-gphc-x7r-6-3v-to-50v-8-12304-13210970.pdf?src-supplier=Mouser, ComponentLink3URL=https://datasheet.ciiva.com/13210/upy-gphc-x7r-6-3v-to-50v-8-12304-13210970.pdf?src-supplier=Mouser, Construction=Flat, Depth=0.5mm, Halogen Free="Halogen Free", Height=0.5mm, Item Type=Capacitor, Lead Free="Lead Free", Length=1mm, Manufacturer Part Number=CC0402JRX7R9BB561, Mounting Technology="Surface Mount", Packaging="Tape and Reel", Pricing="10000=0.0037, 40000=0.0035, 100000=0.0033, 250000=0.0032, 400000=0.003 (USD)", Radiation Hardening=No, RoHS=Yes, RoHS Compliant=Yes, Series=CC, Stock=60000, Supplier="Future Electronics", Termination=SMD/SMT, Thickness=0.022inch, Voltage Rating (DC)=50V, Width=0.5mm
C7 C8: library part GRM21BZ71A226ME15L, "Multilayer Ceramic Capacitor, 22 uF, 10 V, ± 20%, X7R, 0805 [2012 Metric]", LCSC Part Number=C907991, Manufacturer=Murata, Max Operating Temperature=125°C, Min Operating Temperature=-55°C, Package=0805, Supplier Part Number=490-GRM21BZ71A226ME15LCT-ND, Tolerance=20%, Voltage Rating=10V, Category="Ceramic Capacitors", ComponentLink1Description=https://datasheet.octopart.com/GRM21BZ71A226ME15L-Murata-datasheet-165579666.pdf?src-supplier=TME, ComponentLink1URL=https://datasheet.octopart.com/GRM21BZ71A226ME15L-Murata-datasheet-165579666.pdf?src-supplier=TME, ComponentLink2Description=LCSC, ComponentLink2URL=https://www.lcsc.com/product-detail/Multilayer-Ceramic-Capacitors-MLCC-SMD-SMT_Murata-Electronics-GRM21BZ71A226ME15L_C907991.html, Height=1.45mm, Item Type=Capacitor, Length=2mm, Manufacturer Part Number=GRM21BZ71A226ME15L, Material=4241ConductorMaterial, Pricing="1=0.39, 10=0.259, 50=0.191, 100=0.1556, 500=0.12282, 1000=0.10372 (USD)", RoHS=Yes, Stock=49126, Supplier=Digi-Key, Thickness=1.25mm, Width=1.25mm
C9 C10: library part CS3225X7R476K160NRL, "16V 47uF X7R ±10% 1210 Multilayer Ceramic Capacitors MLCC - SMD/SMT ROHS", LCSC Part Number=C5440143, Manufacturer="Samwha Capacitor", Package=1210, ComponentLink1Description=LCSC, ComponentLink1URL=https://www.lcsc.com/product-detail/Multilayer-Ceramic-Capacitors-MLCC-SMD-SMT_Samwha-Capacitor-CS3225X7R476K160NRL_C5440143.html, Item Type=Capacitor, Manufacturer Part Number=CS3225X7R476K160NRL
C11 C12: library part CC0603KRX5R8BB225, "CAP CER 2.2UF 25V X5R 0603", Case Code (Imperial)=0603, Case Code (Metric)=1608, Dielectric=X5R, LCSC Part Number=C309478, Manufacturer=Yageo, Max Operating Temperature=85°C, Min Operating Temperature=-55°C, Package Quantity=4000, Resistor Type=Ceramic, Supplier Part Number 1=311-1786-1-ND, Tolerance=10%, Voltage Rating=25V, Capacitance=2.2uF, Case/Package=0603, ComponentLink1Description=https://www.verical.com/server-webapp/html/getDatasheet?partID=782757&src-supplier=Verical, ComponentLink1URL=https://www.verical.com/server-webapp/html/getDatasheet?partID=782757&src-supplier=Verical, Depth=0.8mm, Halogen Free="Halogen Free", Item Type=Capacitor, Lead Free="Lead Free", Length=1.6mm, Manufacturer Part Number=CC0603KRX5R8BB225, Mount="Surface Mount", Packaging="Tape and Reel", Pricing 1="1=0.4, 10=0.276, 50=0.1932, 100=0.1656, 500=0.1242, 1000=0.10488 (USD)", Radiation Hardening=No, RoHS Compliant=Yes, Stock 1=687936, Supplier 1=Digi-Key, Termination=SMD/SMT, Thickness=0.037inch, Voltage Rating (DC)=25V, Weight=7.1E-05oz, Width=0.031inch
C13: library part CC0603KRX5R9BB474, "CAP CER 0.47UF 50V X5R 0603", Capacitance=470nF, Case/Package=0603, Dielectric=X5R, LCSC Part Number=C513651, Manufacturer=Yageo, Max Operating Temperature=85°C, Min Operating Temperature=-55°C, Supplier Part Number 1=311-4047-1-ND, Tolerance=10%, Voltage Rating=50V, Category="Ceramic Capacitors", ComponentLink1Description="https://www.mouser.com/ds/2/447/ProductSelectionGuide 2014_Final_2-1131690.pdf?src-supplier=Mouser", ComponentLink1URL="https://www.mouser.com/ds/2/447/ProductSelectionGuide 2014_Final_2-1131690.pdf?src-supplier=Mouser", ComponentLink2Description=http://www.yageo.com/documents/recent/UPY-GPHC_X5R_4V-to-50V_25.pdf?src-supplier=Digi-Key, ComponentLink2URL=http://www.yageo.com/documents/recent/UPY-GPHC_X5R_4V-to-50V_25.pdf?src-supplier=Digi-Key, ComponentLink3Description=http://www.yageo.com/exep/pages/download/literatures/ProductSelectionGuide%202014_Final_2.pdf?src-supplier=Digi-Key, ComponentLink3URL=http://www.yageo.com/exep/pages/download/literatures/ProductSelectionGuide%202014_Final_2.pdf?src-supplier=Digi-Key, Halogen Free="Halogen Free", Item Type=Capacitor, Lead Free="Lead Free", Length=0.063inch, Manufacturer Part Number=CC0603KRX5R9BB474, Mount="Surface Mount", Packaging="Tape and Reel", Pricing 1="1=0.45000, 10=0.31400, 50=0.22000, 100=0.18860, 500=0.14144, 1000=0.11944 (USD)", RoHS=Yes, RoHS Compliant=Yes, Stock 1=15145, Supplier 1=Digi-Key, Thickness=0.035inch, Voltage Rating (DC)=50V, Width=0.031inch
C14 C16 C17: library part CC0603KRX7R0BB104, "CAP CER 0.1UF 100V X7R 0603", Capacitance=100nF, Case Code (Imperial)=0603, Case Code (Metric)=1608, Dielectric=X7R, LCSC Part Number=C113803, Manufacturer=Yageo, Max Operating Temperature=125°C, Min Operating Temperature=-55°C, Package Quantity=4000, Resistor Type=Ceramic, Supplier Part Number 1=311-1523-1-ND, Tolerance=10%, Voltage Rating=100V, Case/Package=0603, Category="Ceramic Capacitors", ComponentLink1Description=https://datasheet.ciiva.com/6277/mlccorderingcode-6277030.pdf?src-supplier=Digi-Key, ComponentLink1URL=https://datasheet.ciiva.com/6277/mlccorderingcode-6277030.pdf?src-supplier=Digi-Key, ComponentLink2Description=https://datasheet.ciiva.com/6277/mlccorderingcode-6277081.pdf?src-supplier=Digi-Key, ComponentLink2URL=https://datasheet.ciiva.com/6277/mlccorderingcode-6277081.pdf?src-supplier=Digi-Key, ComponentLink3Description=https://datasheet.ciiva.com/6277/mlccorderingcode-6277082.pdf?src-supplier=Digi-Key, ComponentLink3URL=https://datasheet.ciiva.com/6277/mlccorderingcode-6277082.pdf?src-supplier=Digi-Key, Depth=0.8mm, Item Type=Capacitor, Lead Free="Lead Free", Length=0.063inch, Manufacturer Part Number=CC0603KRX7R0BB104, Mount="Surface Mount", Packaging="Tape and Reel", Pricing 1="1=0.19000, 10=0.13500, 50=0.07680, 100=0.06370, 500=0.04466, 1000=0.03696 (USD)", RoHS=Yes, RoHS Compliant=Yes, Series=CC, Stock 1=60476, Supplier 1=Digi-Key, Termination=SMD/SMT, Thickness=0.035inch, Voltage Rating (DC)=100V, Weight=7.1E-05oz, Width=0.031inch
C15: library part CGA3E2X7R2A223K080AA, "CAP CER 0.022UF 100V X7R 0603", Case Code (Imperial)=0603, Case Code (Metric)=1608, Dielectric=X7R, LCSC Part Number=C2167165, Manufacturer=TDK, Max Operating Temperature=125°C, Min Operating Temperature=-55°C, Package Quantity=1, Ratings=AEC-Q200, Resistor Type=Ceramic, Supplier Part Number 1=445-5814-1-ND, Tolerance=10%, Voltage Rating=100V, Capacitance=22nF, Case/Package=0603, Category="Ceramic Capacitors", ComponentLink1Description=https://datasheet.ciiva.com/22725/1735406-22725648.pdf?src-supplier=Element14, ComponentLink1URL=https://datasheet.ciiva.com/22725/1735406-22725648.pdf?src-supplier=Element14, ComponentLink2Description=https://datasheet.ciiva.com/24218/cga3e2x7r2a223k080aa-266292-24218959.pdf?src-supplier=Mouser, ComponentLink2URL=https://datasheet.ciiva.com/24218/cga3e2x7r2a223k080aa-266292-24218959.pdf?src-supplier=Mouser, ComponentLink3Description=https://datasheet.ciiva.com/7975/1807242-7975349.pdf?src-supplier=Element14, ComponentLink3URL=https://datasheet.ciiva.com/7975/1807242-7975349.pdf?src-supplier=Element14, Depth=0.8mm, Height=0.8mm, Item Type=Capacitor, Length=1.6mm, Manufacturer Part Number=CGA3E2X7R2A223K080AA, Mount="Surface Mount", Packaging="Tape and Reel", Pricing 1="1=0.11000, 10=0.07600, 50=0.04340, 100=0.03590, 500=0.02516, 1000=0.02083 (USD)", REACH SVHC="No SVHC", RoHS=Yes, RoHS Compliant=Yes, Series=CGA, Stock 1=56079, Supplier 1=Digi-Key, Termination=SMD/SMT, Thickness=0.035inch, Voltage Rating (DC)=100V, Weight=7.1E-05oz, Width=0.031inch
C18 C40: library part RVT1H101M0607, "100uF 50V ±20% SMD,D6.3xL7.7mm Aluminum Electrolytic Capacitors - SMD ROHS", LCSC Part Number=C3151829, Manufacturer=ROQANG, Package=SMD,D6.3xL7.7mm, ComponentLink1Description=LCSC, ComponentLink1URL=https://www.lcsc.com/product-detail/Aluminum-Electrolytic-Capacitors-SMD_ROQANG-RVT1H101M0607_C3151829.html, Item Type=Capacitor, Manufacturer Part Number=RVT1H101M0607
C19 C20 C22 C23: library part CC0603KRX7R9BB224, "CAP CER 0.22 uF, 50 V, ± 10%, X7R, 0603 [1608 Metric]", Case Code (Imperial)=0603, Case Code (Metric)=1608, LCSC Part Number=C107083, Manufacturer=Yageo, Max Operating Temperature=125°C, Min Operating Temperature=-55°C, Supplier Part Number=8068995, Tolerance=10%, Voltage Rating=50V, Case/Package=0603, Category="Ceramic Capacitors", ComponentLink1Description=http://www.yageo.com/documents/recent/UPY-GPHC_X7R_6.3V-to-50V_18.pdf?src-supplier=Digi-Key, ComponentLink1URL=http://www.yageo.com/documents/recent/UPY-GPHC_X7R_6.3V-to-50V_18.pdf?src-supplier=Digi-Key, ComponentLink2Description=https://www.yageo.com/upload/media/product/productsearch/datasheet/mlcc/UPY-GPHC_X7R_6.3V-to-50V_18.pdf?src-supplier=Digi-Key, ComponentLink2URL=https://www.yageo.com/upload/media/product/productsearch/datasheet/mlcc/UPY-GPHC_X7R_6.3V-to-50V_18.pdf?src-supplier=Digi-Key, ComponentLink3Description=https://datasheet.octopart.com/CC0603KRX7R9BB224-Yageo-datasheet-140260305.pdf?src-supplier=Newark, ComponentLink3URL=https://datasheet.octopart.com/CC0603KRX7R9BB224-Yageo-datasheet-140260305.pdf?src-supplier=Newark, ComponentLink4Description=https://datasheet.octopart.com/CC0603KRX7R9BB224-Yageo-datasheet-137700082.pdf?src-supplier=Future+Electronics, ComponentLink4URL=https://datasheet.octopart.com/CC0603KRX7R9BB224-Yageo-datasheet-137700082.pdf?src-supplier=Future+Electronics, ComponentLink5Description=https://datasheet.octopart.com/CC0603KRX7R9BB224-Yageo-datasheet-166511530.pdf?src-supplier=Future+Electronics, ComponentLink5URL=https://datasheet.octopart.com/CC0603KRX7R9BB224-Yageo-datasheet-166511530.pdf?src-supplier=Future+Electronics, ComponentLink6Description=LCSC, ComponentLink6URL=https://www.lcsc.com/product-detail/Multilayer-Ceramic-Capacitors-MLCC-SMD-SMT_YAGEO-CC0603KRX7R9BB224_C107083.html, Halogen Free="Halogen Free", Height=900um, Item Type=Capacitor, Lead Free="Lead Free", Length=0.063inch, Manufacturer Part Number=CC0603KRX7R9BB224, Material=4241ConductorMaterial, Mounting Technology="Surface Mount", Packaging="Cut Tape", Pricing="4000=0.0134, 12000=0.013, 40000=0.0125, 80000=0.0122, 160000=0.0117 (USD)", RoHS=Yes, RoHS Compliant=Yes, Series=CC, Stock=1468000, Supplier="Future Electronics", Thickness=0.035inch, Voltage Rating (DC)=50V, Width=0.031inch
C21 C24: library part CC0603KRX7R9BB474, "CAP CER 0.47 uF, 50 V, ± 10%, X7R, 0603 [1608 Metric]", Dielectric=1511DielectricType, LCSC Part Number=C513577, Manufacturer=Yageo, Max Operating Temperature=125°C, Min Operating Temperature=-55°C, Package=0603, Supplier Part Number=3124150, Voltage Rating=50V, Category="Ceramic Capacitors", ComponentLink1Description=https://datasheet.octopart.com/CC0603KRX7R9BB474-Yageo-datasheet-147453679.pdf?src-supplier=Newark, ComponentLink1URL=https://datasheet.octopart.com/CC0603KRX7R9BB474-Yageo-datasheet-147453679.pdf?src-supplier=Newark, ComponentLink2Description=https://datasheet.octopart.com/CC0603KRX7R9BB474-Yageo-datasheet-166511530.pdf?src-supplier=Future+Electronics, ComponentLink2URL=https://datasheet.octopart.com/CC0603KRX7R9BB474-Yageo-datasheet-166511530.pdf?src-supplier=Future+Electronics, ComponentLink3Description=https://datasheet.octopart.com/CC0603KRX7R9BB474-Yageo-datasheet-151948686.pdf?src-supplier=Farnell, ComponentLink3URL=https://datasheet.octopart.com/CC0603KRX7R9BB474-Yageo-datasheet-151948686.pdf?src-supplier=Farnell, ComponentLink4Description=LCSC, ComponentLink4URL=https://www.lcsc.com/product-detail/Multilayer-Ceramic-Capacitors-MLCC-SMD-SMT_YAGEO-CC0603KRX7R9BB474_C513577.html, Halogen Free=5694HalogenFree, Height=900um, Item Type=Capacitor, Lead Free=5697LeadFree, Manufacturer Part Number=CC0603KRX7R9BB474, Material=4241ConductorMaterial, Pricing="4000=0.0623, 8000=0.0607, 12000=0.0598, 16000=0.0591, 20000=0.0571 (USD)", RoHS=Yes, RoHS Compliant=Yes, Stock=44000, Supplier="Future Electronics", Voltage Rating (DC)=50V
C25 C26 C27 C28: library part CL10B102KC8NNNC, "CAP CER 1nF 100V X7R 0603", Case Code (Imperial)=0603, Case Code (Metric)=1608, Dielectric=X7R, LCSC Part Number=C153291, Manufacturer=Samsung, Max Operating Temperature=125°C, Min Operating Temperature=-55°C, Package Quantity=1, Tolerance=10%, Voltage=100V, Capacitance=1nF, Case/Package=0603, Category="Ceramic Capacitors", ComponentLink1Description=https://datasheet.ciiva.com/25799/cl10b102kc8nnnc-25799476.pdf?src-supplier=Digi-Key, ComponentLink1URL=https://datasheet.ciiva.com/25799/cl10b102kc8nnnc-25799476.pdf?src-supplier=Digi-Key, ComponentLink2Description=https://datasheet.ciiva.com/29198/458286-da-01-en-vs-kondensator-0603-29198496.pdf?src-supplier=Conrad, ComponentLink2URL=https://datasheet.ciiva.com/29198/458286-da-01-en-vs-kondensator-0603-29198496.pdf?src-supplier=Conrad, ComponentLink3Description=https://datasheet.ciiva.com/26838/getdatasheetpartid-640779-26838395.pdf?src-supplier=Verical, ComponentLink3URL=https://datasheet.ciiva.com/26838/getdatasheetpartid-640779-26838395.pdf?src-supplier=Verical, ComponentLink4Description=https://datasheet.ciiva.com/26310/mlcc-catalogdownload2013-eng-26310266.pdf?src-supplier=Distrelec, ComponentLink4URL=https://datasheet.ciiva.com/26310/mlcc-catalogdownload2013-eng-26310266.pdf?src-supplier=Distrelec, ComponentLink5Description=https://datasheet.ciiva.com/16199/cl05b104kq5nnnc-16199246.pdf?src-supplier=Future+Electronics, ComponentLink5URL=https://datasheet.ciiva.com/16199/cl05b104kq5nnnc-16199246.pdf?src-supplier=Future+Electronics, Construction=Flat, Contact Plating=Tin, Depth=0.8mm, Height=0.8mm, Lead Free="Lead Free", Length=1.6mm, Manufacturer Part Number=CL10B102KC8NNNC, Material=Ceramic, Mount="Surface Mount", Packaging="Tape and Reel", Pricing 1="4000=0.00988, 8000=0.00987, 16000=0.00986, 24000=0.00985, 32000=0.00984, 40000=0.00982, 400000=0.00981 (USD)", Radiation Hardening=No, RoHS=Yes, RoHS Compliant=Yes, Series=CL, Stock 1=184000, Supplier 1=Avnet, Supplier Part Number 1=CL10B102KC8NNNC, Thickness=0.035inch, Voltage Rating=100V, Voltage Rating (DC)=100V, Width=0.031inch
C29 C30 C31 C32 C34 C35 C36 C37: library part CGA1A2C0G1E100D030BA, "CAP CER 10PF 25V C0G 0201", Case Code (Imperial)=0201, Case Code (Metric)=0603, Dielectric=C0G, LCSC Part Number=C2168728, Manufacturer=TDK, Max Operating Temperature=125°C, Min Operating Temperature=-55°C, Package Quantity=1, Ratings=AEC-Q200, Resistor Type=Ceramic, Supplier Part Number 1=445-9023-1-ND, Voltage Rating=25V, Capacitance=10pF, Case/Package=0201, Category="Ceramic Capacitors", ComponentLink1Description=https://datasheet.ciiva.com/24220/cga1a2c0g1e100d030ba-271838-24220873.pdf?src-supplier=Mouser, ComponentLink1URL=https://datasheet.ciiva.com/24220/cga1a2c0g1e100d030ba-271838-24220873.pdf?src-supplier=Mouser, Depth=0.3mm, Height=0.3mm, Item Type=Capacitor, Length=0.6mm, Manufacturer Part Number=CGA1A2C0G1E100D030BA, Mount="Surface Mount", Packaging="Tape and Reel", Pricing 1="1=0.11000, 10=0.07900, 50=0.04340, 100=0.03540, 500=0.02530, 1000=0.01987, 2500=0.01807, 5000=0.01662 (USD)", RoHS=Yes, RoHS Compliant=Yes, Series=CGA, Stock 1=28695, Supplier 1=Digi-Key, Termination=SMD/SMT, Thickness=0.013inch, Voltage Rating (DC)=25V, Weight=6E-06oz, Width=0.3mm
C33 C38: library part CC0201KRX5R8BB223, "CAP CER 0.022UF 25V X5R 0201", Case/Package=344Case, Dielectric=1537DielectricType, LCSC Part Number=C505472, Max Operating Temperature=85°C, Min Operating Temperature=-55°C, Supplier Part Number=9164548, Voltage Rating=25V, Category="Ceramic Capacitors", ComponentLink1Description=LCSC, Halogen Free=5694HalogenFree, Height=330um, Item Type=Capacitor, Lead Free=5697LeadFree, Material=4241ConductorMaterial, Pricing="15000=0.0018, 60000=0.0017, 225000=0.0016, 375000=0.0016, 750000=0.0015 (USD)", RoHS=Yes, Stock=15000, Supplier="Future Electronics", Voltage Rating (DC)=25V
C39: library part CC0201KRX5R8BB102, "CAP CER 1000PF 25V X5R 0201", Case/Package=0201, Dielectric=X5R, LCSC Part Number=C541213, Manufacturer=Yageo, Max Operating Temperature=85°C, Min Operating Temperature=-55°C, Supplier Part Number 1=603-CC0201KR8BB102, Tolerance=10%, Voltage Rating=25V, Capacitance=1nF, Category="Ceramic Capacitors", ComponentLink1Description=http://www.yageo.com/documents/recent/UPY-GPHC_X5R_4V-to-50V_25.pdf?src-supplier=Digi-Key, ComponentLink1URL=http://www.yageo.com/documents/recent/UPY-GPHC_X5R_4V-to-50V_25.pdf?src-supplier=Digi-Key, ComponentLink2Description=https://www.yageo.com/upload/media/product/productsearch/datasheet/mlcc/UPY-GPHC_X5R_4V-to-50V_25.pdf?src-supplier=Digi-Key, ComponentLink2URL=https://www.yageo.com/upload/media/product/productsearch/datasheet/mlcc/UPY-GPHC_X5R_4V-to-50V_25.pdf?src-supplier=Digi-Key, ComponentLink3Description=http://www.yageo.com/exep/pages/download/literatures/ProductSelectionGuide%202014_Final_2.pdf?src-supplier=Digi-Key, ComponentLink3URL=http://www.yageo.com/exep/pages/download/literatures/ProductSelectionGuide%202014_Final_2.pdf?src-supplier=Digi-Key, Halogen Free="Halogen Free", Lead Free="Lead Free", Length=0.024inch, Manufacturer Part Number=CC0201KRX5R8BB102, Mount="Surface Mount", Packaging="Tape and Reel", Pricing 1="1=0.10000, 10=0.02600, 50=0.02600, 100=0.01100, 1000=0.00700, 10000=0.00500 (USD)", RoHS=Yes, RoHS Compliant=Yes, Stock 1=54104, Supplier 1=Mouser, Thickness=0.013inch, Voltage Rating (DC)=25V, Width=0.012inch
D1: "DIODE SCHOTTKY 60V 5A SMA", LCSC Par Number=C65009, Manufacturer=MDD, ComponentLink1Description=LCSC, ComponentLink1URL=https://www.lcsc.com/product-detail/Schottky-Barrier-Diodes-SBD_MDD-Microdiode-Electronics-SS56_C65009.html, Iterm Type=Diode, Manufacturer Part Number=SS56
D2: "TVS DIODE 48VWM 77.4VC DO214AC", Breakdown Voltage=53.3V, Case/Package=DO-214AC, Clamping Voltage=77.4V, LCSC Part Number=C223991, Leakage Current=1uA, Manufacturer=Littelfuse, Max Breakdown Voltage=58.9V, Max Operating Temperature=150°C, Max Power Dissipation=3.3W, Max Surge Current=5.2A, Min Operating Temperature=-65°C, Operating Supply Voltage=48V, Package=SMA(DO-214AC), Package Quantity=5000, Peak Pulse Power=400W, Power Line Protection=No, Supplier Part Number=1719659, Test Current=1mA, Category="TVS Diodes", Clamping Voltage-Max=77.4V, ComponentLink1Description=LCSC, ComponentLink2Description=https://datasheet.ciiva.com/28649/607617-28649159.pdf?src-supplier=Element14, ComponentLink2URL=https://datasheet.ciiva.com/28649/607617-28649159.pdf?src-supplier=Element14, ComponentLink3Description=https://datasheet.ciiva.com/16391/littelfuse-tvs-diode-smaj-16391798.pdf?src-supplier=Future+Electronics, ComponentLink3URL=https://datasheet.ciiva.com/16391/littelfuse-tvs-diode-smaj-16391798.pdf?src-supplier=Future+Electronics, ComponentLink4Description=https://datasheet.ciiva.com/330/littelfuse-tvs-diode-smaj-datasheet-pdf-330802.pdf?src-supplier=Digi-Key, ComponentLink4URL=https://datasheet.ciiva.com/330/littelfuse-tvs-diode-smaj-datasheet-pdf-330802.pdf?src-supplier=Digi-Key, ComponentLink5Description=https://datasheet.ciiva.com/330/littelfuse-tvs-diode-smaj-datasheet-pdf-330803.pdf?src-supplier=Digi-Key, ComponentLink5URL=https://datasheet.ciiva.com/330/littelfuse-tvs-diode-smaj-datasheet-pdf-330803.pdf?src-supplier=Digi-Key, ComponentLink6Description=https://datasheet.ciiva.com/330/littelfuse-tvs-diode-smaj-datasheet-pdf-330804.pdf?src-supplier=Digi-Key, ComponentLink6URL=https://datasheet.ciiva.com/330/littelfuse-tvs-diode-smaj-datasheet-pdf-330804.pdf?src-supplier=Digi-Key, Diode Type=ZENER, Direction=Unidirectional, Height=2.29mm, Item Type="TVS  Diode", Lead Free="Lead Free", Length=5.28mm, Manufacturer Part Number=SMAJ48A, Min Breakdown Voltage=53.3V, Mounting Technology="Surface Mount", Number of Channels=1, Number of Elements=1, Number of Unidirectional Channels=1, Packaging="Tape and Reel", Peak Pulse Current=5.2A, Pins=2, Polarity=Unidirectional, Power Dissipation=400W, Pricing="25=0.231, 100=0.214, 500=0.209, 1000=0.204 (GBP)", Reach SVHC Compliant=No, Reverse Breakdown Voltage=53.3V, Reverse Standoff Voltage=48V, RoHS=Yes, RoHS Compliant=Yes, Series=SMAJ, Stock=2975, Supplier=Rs, Termination=SMD/SMT, Voltage Rating (DC)=48V, Width=2.79mm
D3: "Schottky Barrier Diode SK36, DO-214AB, 3A/60V", Average Rectified Current=3A, Case/Package=SMC, Forward Voltage=750mV, LCSC Part Number=C16015, Manufacturer="ON Semiconductor / Fairchild", Max Forward Surge Current (Ifsm)=100A, Max Operating Temperature=150°C, Max Repetitive Reverse Voltage (Vrrm)=60V, Max Reverse Current=500uA, Min Operating Temperature=-55°C, Package Quantity=3000, Power Dissipation=2.27W, Supplier Part Number 1=9034425P, Category="Schottky Diodes", ComponentLink1Description=https://datasheet.ciiva.com/4714/ss36-197193-4714610.pdf?src-supplier=Mouser, ComponentLink1URL=https://datasheet.ciiva.com/4714/ss36-197193-4714610.pdf?src-supplier=Mouser, ComponentLink2Description=https://datasheet.ciiva.com/16889/ss36-16889545.pdf?src-supplier=Future+Electronics, ComponentLink2URL=https://datasheet.ciiva.com/16889/ss36-16889545.pdf?src-supplier=Future+Electronics, ComponentLink3Description=https://datasheet.ciiva.com/920/ss34-920433.pdf?src-supplier=Digi-Key, ComponentLink3URL=https://datasheet.ciiva.com/920/ss34-920433.pdf?src-supplier=Digi-Key, ComponentLink4Description=https://datasheet.ciiva.com/920/ss34-920434.pdf?src-supplier=Digi-Key, ComponentLink4URL=https://datasheet.ciiva.com/920/ss34-920434.pdf?src-supplier=Digi-Key, ComponentLink5Description=https://datasheet.ciiva.com/920/ss34-920435.pdf?src-supplier=Digi-Key, ComponentLink5URL=https://datasheet.ciiva.com/920/ss34-920435.pdf?src-supplier=Digi-Key, Current=3A, Current Rating=3A, Element Configuration=Single, Forward Current=3A, Item Type=Diode, Lead Free="Lead Free", Manufacturer Part Number=SS36, Max Reverse Leakage Current=500uA, Max Reverse Voltage (DC)=60V, Max Surge Current=100A, Mount="Surface Mount", Number of Pins=2, Output Current=3A, Packaging="Tape and Reel", Peak Non-Repetitive Surge Current=100A, Polarity=Standard, Pricing 1="100=0.43800, 500=0.34200, 1000=0.27800, 3000=0.25000 (GBP)", Radiation Hardening=No, Reach SVHC Compliant=Yes, RoHS=Yes, RoHS Compliant=Yes, Series=-, Stock 1=100, Supplier 1=Rs, Voltage=60V, Voltage Rating (DC)=60V
D4: "TVS DIODE 3.3VWM 11.5VC MICROSMP", Breakdown Voltage=4.1V, Clamping Voltage=11V, LCSC Part Number=C241899, Max Operating Temperature=150°C, Max Reverse Leakage Current=200uA, Max Surge Current=75A, Min Operating Temperature=-55°C, Operating Supply Voltage=3.3V, Package Quantity=4500, Peak Pulse Current=87A, Peak Pulse Power=150W, Power Line Protection=No, Supplier Part Number=625-MSP3V3HM3, Test Current=1mA, Category="TVS Diodes", ComponentLink1Description=LCSC, ComponentLink2Description=https://datasheet.ciiva.com/14080/msp3v3-14080471.pdf?src-supplier=Digi-Key, ComponentLink2URL=https://datasheet.ciiva.com/14080/msp3v3-14080471.pdf?src-supplier=Digi-Key, Diode Type=ZENER, Direction=Unidirectional, Item Type="TVS Diode", Min Breakdown Voltage=4.1V, Mounting Technology="Surface Mount", Number of Unidirectional Channels=1, Packaging="Tape and Reel", Polarity=Unidirectional, Pricing="1=0.39, 10=0.313, 50=0.313, 100=0.165, 1000=0.068, 10000=0.05 (USD)", Reverse Standoff Voltage=3.3V, RoHS=Yes, RoHS Compliant=Yes, Series="Automotive, AEC-Q101, TransZorb®, eSMP™", Stock=15021, Supplier=Mouser
D5: "TVS DIODE 12VWM 19.9VC MICROSMP", LCSC Part Number=C1973858, Max Operating Temperature=150°C, Min Breakdown Voltage=13.3V, Min Operating Temperature=-55°C, Peak Pulse Current=7.5A, Peak Pulse Power=150W, Power Line Protection=No, Reverse Standoff Voltage=12V, Supplier Part Number=78-MSMP12A-M389A, Category="TVS Diodes", ComponentLink1Description=LCSC, ComponentLink2Description=http://www.vishay.com/docs/89457/mspm6a.pdf?src-supplier=Digi-Key, ComponentLink2URL=http://www.vishay.com/docs/89457/mspm6a.pdf?src-supplier=Digi-Key, ComponentLink3Description=http://www.vishay.com/docs/89457/msmp6athrumsmp20a.pdf?src-supplier=Digi-Key, ComponentLink3URL=http://www.vishay.com/docs/89457/msmp6athrumsmp20a.pdf?src-supplier=Digi-Key, Diode Type=ZENER, Item Type="TVS Diode", Mounting Technology="Surface Mount", Number of Unidirectional Channels=1, Packaging="Tape and Reel", Pricing="1=0.36, 10=0.294, 50=0.294, 100=0.118, 1000=0.069, 10000=0.048 (USD)", RoHS=Yes, RoHS Compliant=Yes, Series=TransZorb®, Stock=17037, Supplier=Mouser
D6: "DIODE GEN PURP 75V 200MA SOD523F", Average Rectified Current=200mA, Forward Current=300mA, LCSC Part Number=C232841, Manufacturer="ON Semiconductor / Fairchild", Max Forward Surge Current (Ifsm)=4A, Max Operating Temperature=150°C, Max Repetitive Reverse Voltage (Vrrm)=75V, Max Reverse Current=5uA, Min Operating Temperature=-55°C, Package Quantity=1, Power Dissipation=200mW, Supplier Part Number 1=6145918, Category="Rectifier Diodes", ComponentLink1Description=https://datasheet.ciiva.com/16744/1n4148wt-16744972.pdf?src-supplier=Future+Electronics, ComponentLink1URL=https://datasheet.ciiva.com/16744/1n4148wt-16744972.pdf?src-supplier=Future+Electronics, ComponentLink2Description=https://datasheet.ciiva.com/30479/0900766b810e1cd4-30479226.pdf?src-supplier=Rs, ComponentLink2URL=https://datasheet.ciiva.com/30479/0900766b810e1cd4-30479226.pdf?src-supplier=Rs, ComponentLink3Description=https://datasheet.ciiva.com/15208/getdatasheetpartid-146392-15208359.pdf?src-supplier=Verical, ComponentLink3URL=https://datasheet.ciiva.com/15208/getdatasheetpartid-146392-15208359.pdf?src-supplier=Verical, ComponentLink4Description=https://datasheet.ciiva.com/916/1n914bwt-916865.pdf?src-supplier=Digi-Key, ComponentLink4URL=https://datasheet.ciiva.com/916/1n914bwt-916865.pdf?src-supplier=Digi-Key, ComponentLink5Description=https://datasheet.ciiva.com/916/1n914bwt-916866.pdf?src-supplier=Digi-Key, ComponentLink5URL=https://datasheet.ciiva.com/916/1n914bwt-916866.pdf?src-supplier=Digi-Key, ComponentLink6Description=https://datasheet.ciiva.com/916/1n914bwt-916864.pdf?src-supplier=Digi-Key, ComponentLink6URL=https://datasheet.ciiva.com/916/1n914bwt-916864.pdf?src-supplier=Digi-Key, Contact Plating=Tin,Matte, Element Configuration=Single, Height=0.7mm, Item Type=Diode, Lead Free="Lead Free", Length=1.3mm, Manufacturer Part Number=1N4148WT, Max Reverse Voltage (DC)=75V, Mounting Technology="Surface Mount", Packaging="Tape and Reel", Pins=2, Pricing 1="1=0.0305, 20=0.0267, 125=0.0246, 750=0.0227, 4000=0.0204 (USD)", Radiation Hardening=No, Reach SVHC Compliant=No, Recovery Time=4ns, Reverse Recovery Time=4ns, Reverse Recovery Time-Max=4ns, RoHS=Yes, RoHS Compliant=Yes, Series=-, Stock 1=30, Supplier 1="Future Electronics", Weight=0.01g, Width=0.9mm
J1 J2: "Gold 250V 3A Straight Square Pins 2.5mm 2P 260℃ 6mm -40℃~+105℃ 3mm 2.54mm Plugin Black Brass 1x2P Plugin,P=2.54mm Pin Headers ROHS", LCSC Part Number=C706874, Manufacturer=XKB, Package=Plugin,P=2.54mm, ComponentLink1Description=LCSC, ComponentLink1URL=https://www.lcsc.com/product-detail/Pin-Headers_XKB-Connectivity-X6511WV-02H-C60D30_C706874.html, Item Type="Male Header", Manufacturer Part Number=X6511WV-02H-C60D30
J3 J4: "1x1 Port Tab upright Surface Mount RJ45 Connector with Integrated Magnetics and LED", Manufacturer=Hanrun, Package=Custom, Item Type="Ethernet Connector", Manufacturer Part Number=HR963370A
J5: "Gold 250V 3A Brick nogging Square Pins 2.5mm 3P 260℃ 6mm -40℃~+105℃ 2.54mm Plugin Black Brass 1x3P SMD,P=2.54mm(交错脚) Pin Headers ROHS", LCSC Part Number=C780061, Manufacturer="XKB Connectivity", Package=SMD,P=2.54mm, ComponentLink1Description=LCSC, ComponentLink1URL=https://www.lcsc.com/product-detail/Pin-Headers_XKB-Connectivity-X6511WVS-03H-C60D48R1_C780061.html, Item Type="Male Header", Manufacturer Part Number=X6511WVS-03H-C60D48R1
J6: "CONN HDR 1.27MM SMD 32POS", Manufacturer=Harwin, Supplier Part Number=855-M55-7013242R, Category=Connectors, Item Type="Connector Header", Manufacturer Part Number=M55-7013242R, Pricing="1=2.13, 10=1.82, 50=1.82, 100=1.63, 1000=1.17, 10000=1.07 (USD)", RoHS=Yes, Stock=1347, Supplier=Mouser